# Altium PCB TIE2019_rezolvare.PcbDoc (part 1 of 2)
Units mm, origin at the board's own origin, x right, y up, seen from the top; angles counter-clockwise.
Board outline 267 x 129 mm, 8 copper layers (Signal 1, GND/Signal 2, GND 3, Signal 4, GND, Power/Signal 6, GND 7, Signal 8), stack 1.597 mm thick; 97 components, 82 nets, 657 pads, 352 vias.
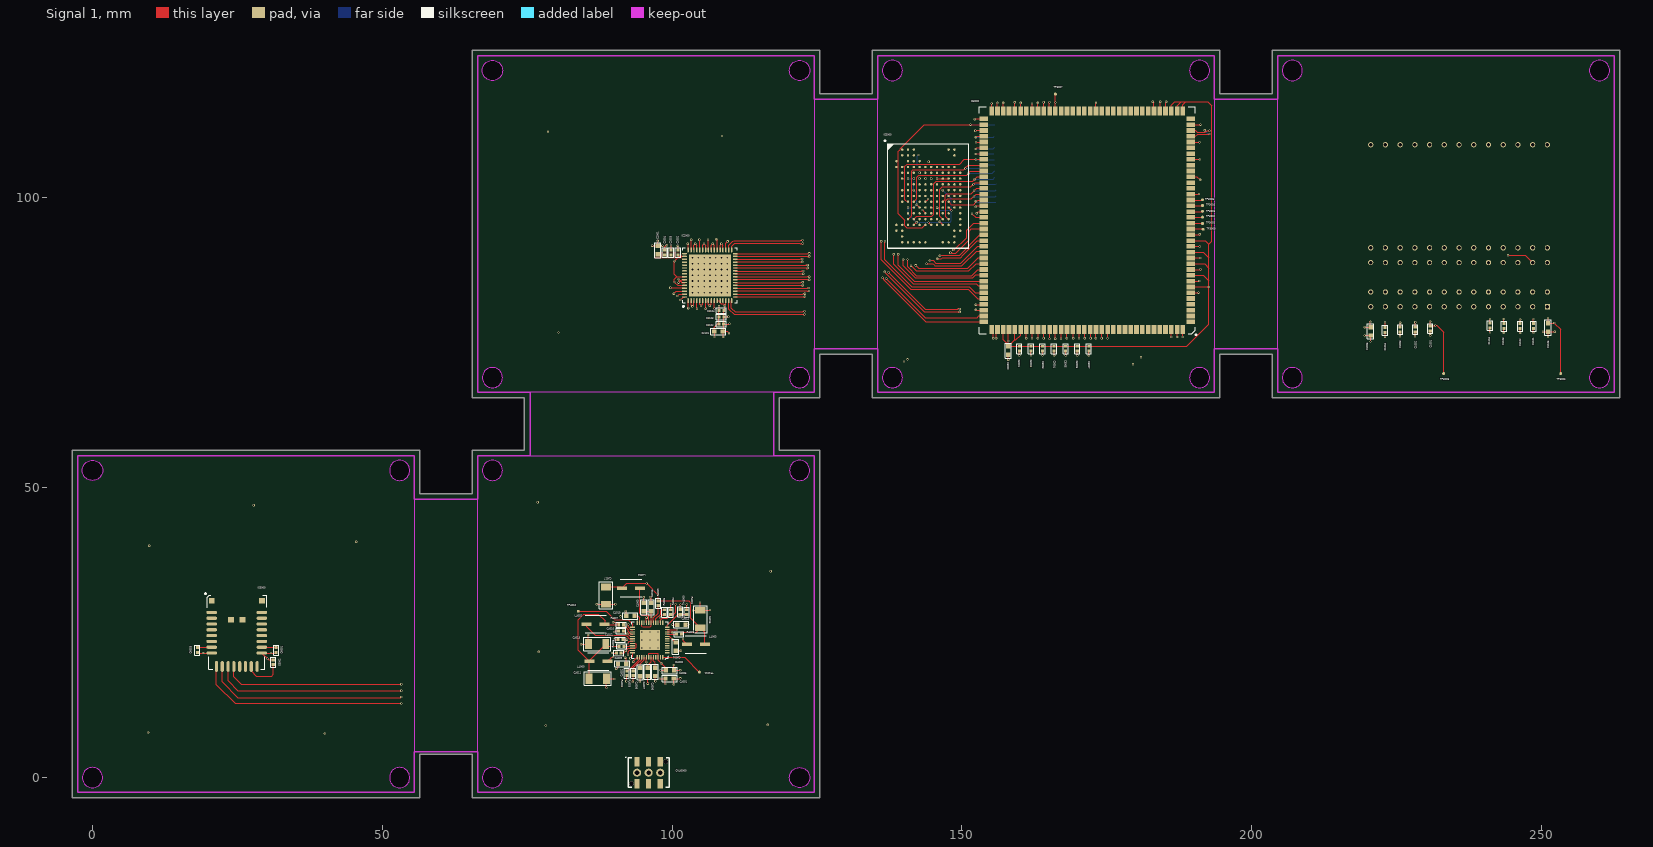
[diagram p0: Signal 1 view]
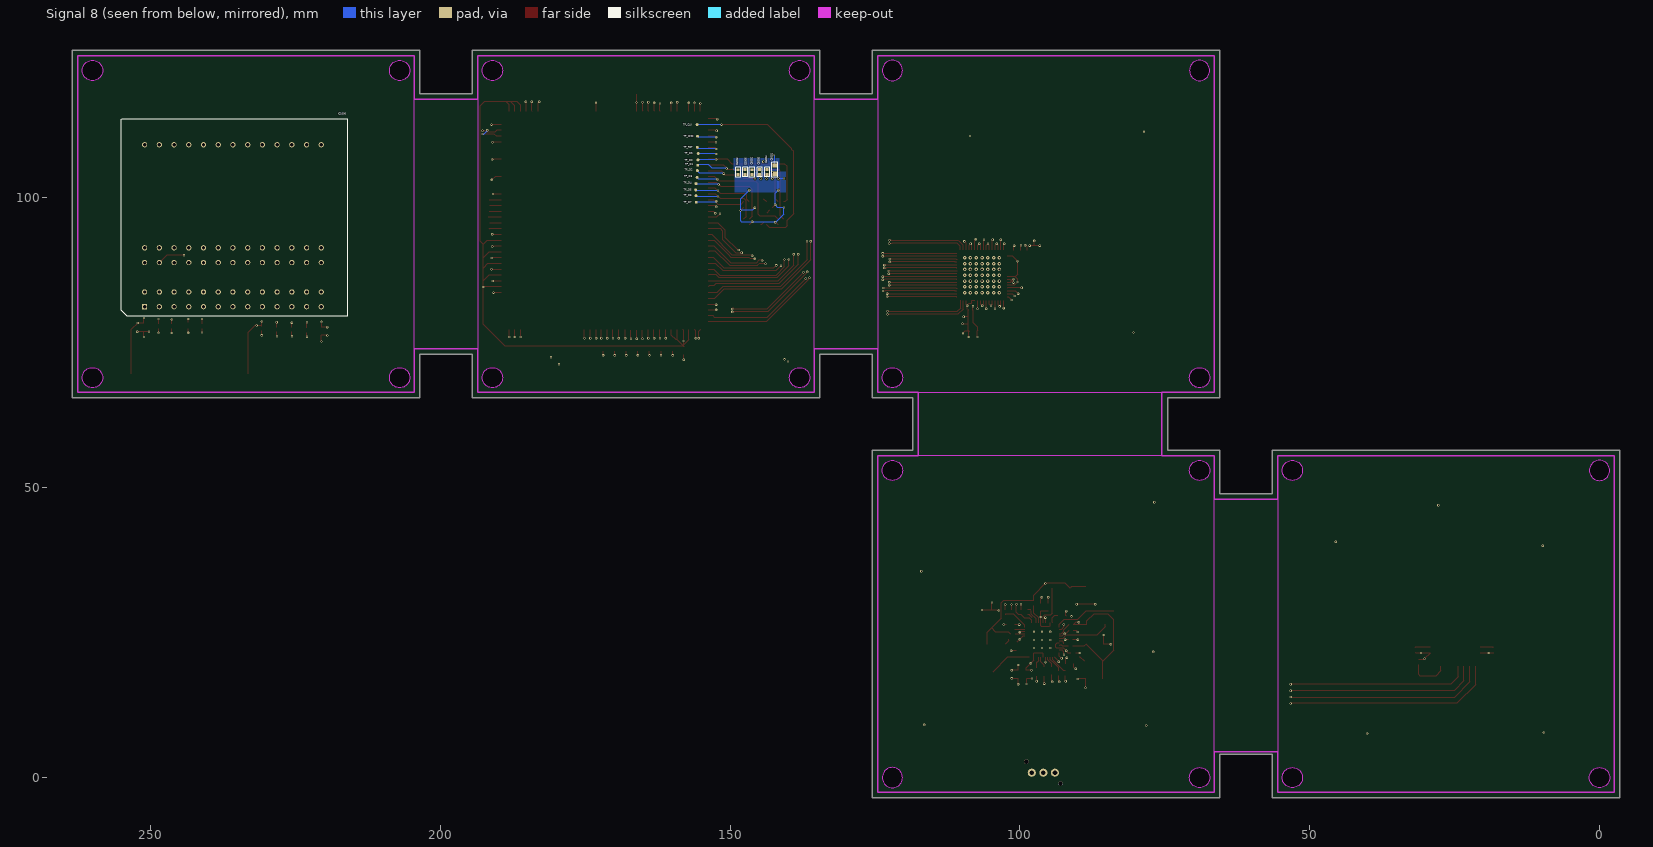
[diagram p1: Signal 8 view, seen from below]
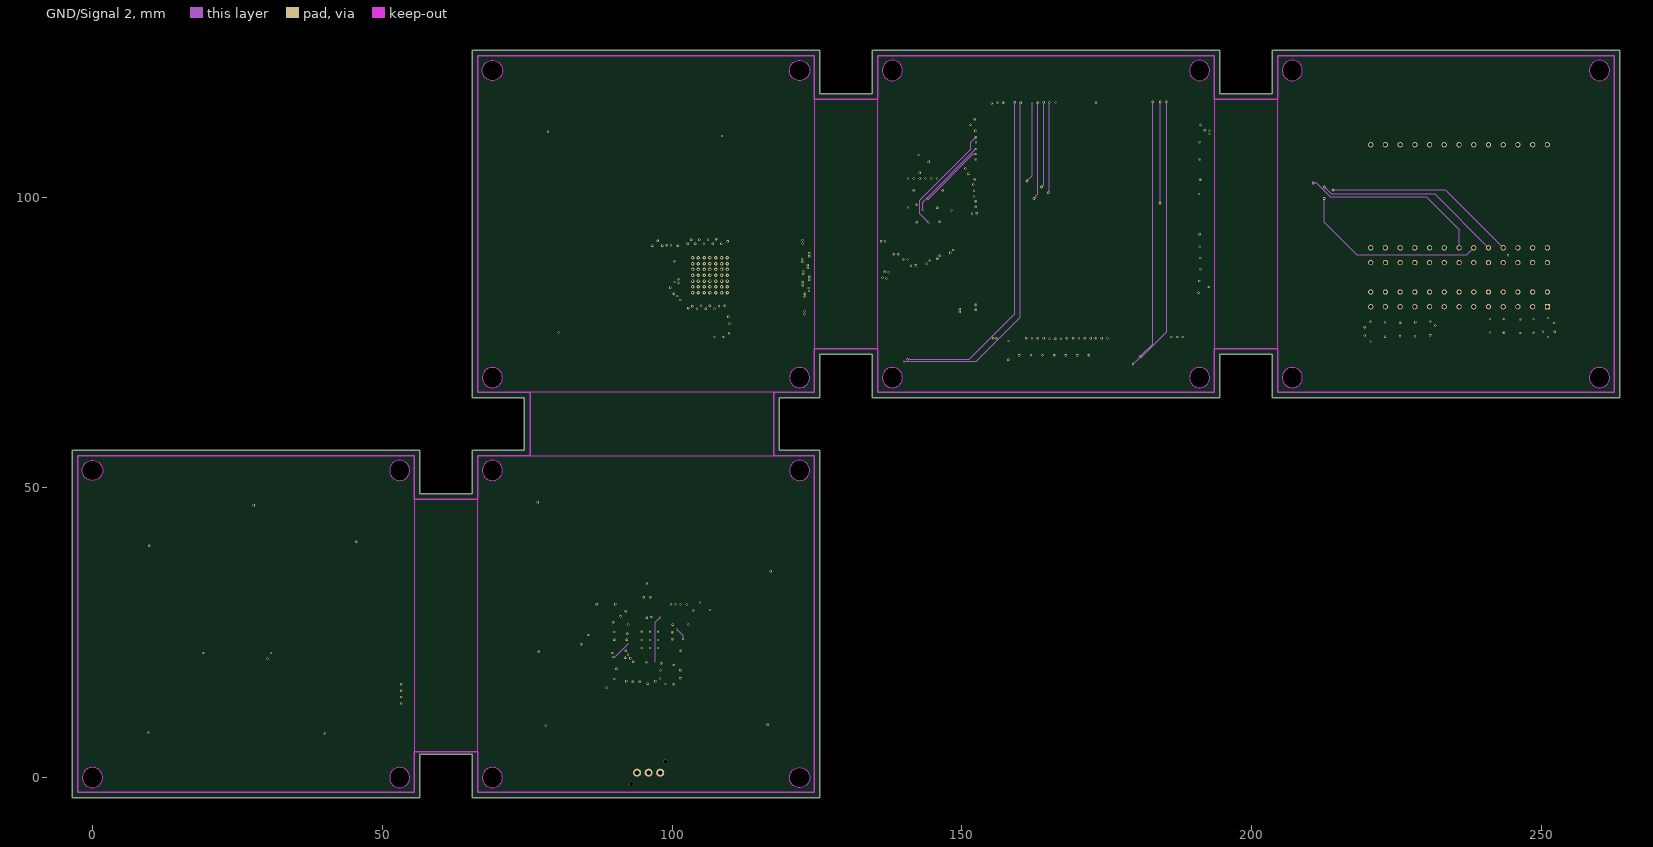
[diagram p2: GND/Signal 2]
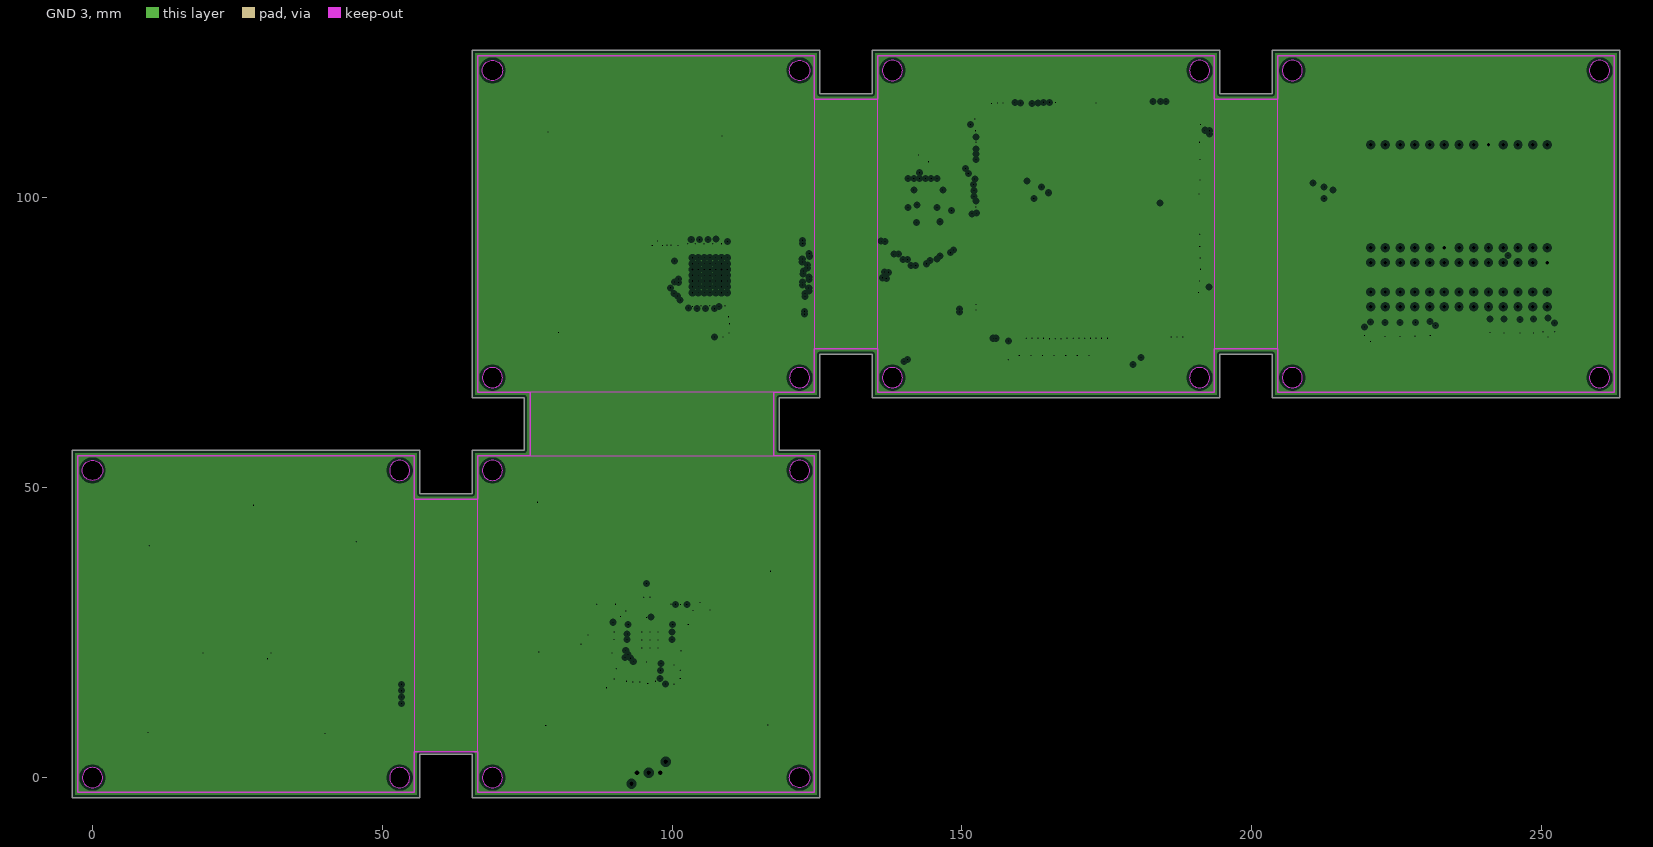
[diagram p3: GND 3, clearances drawn from the general rule]
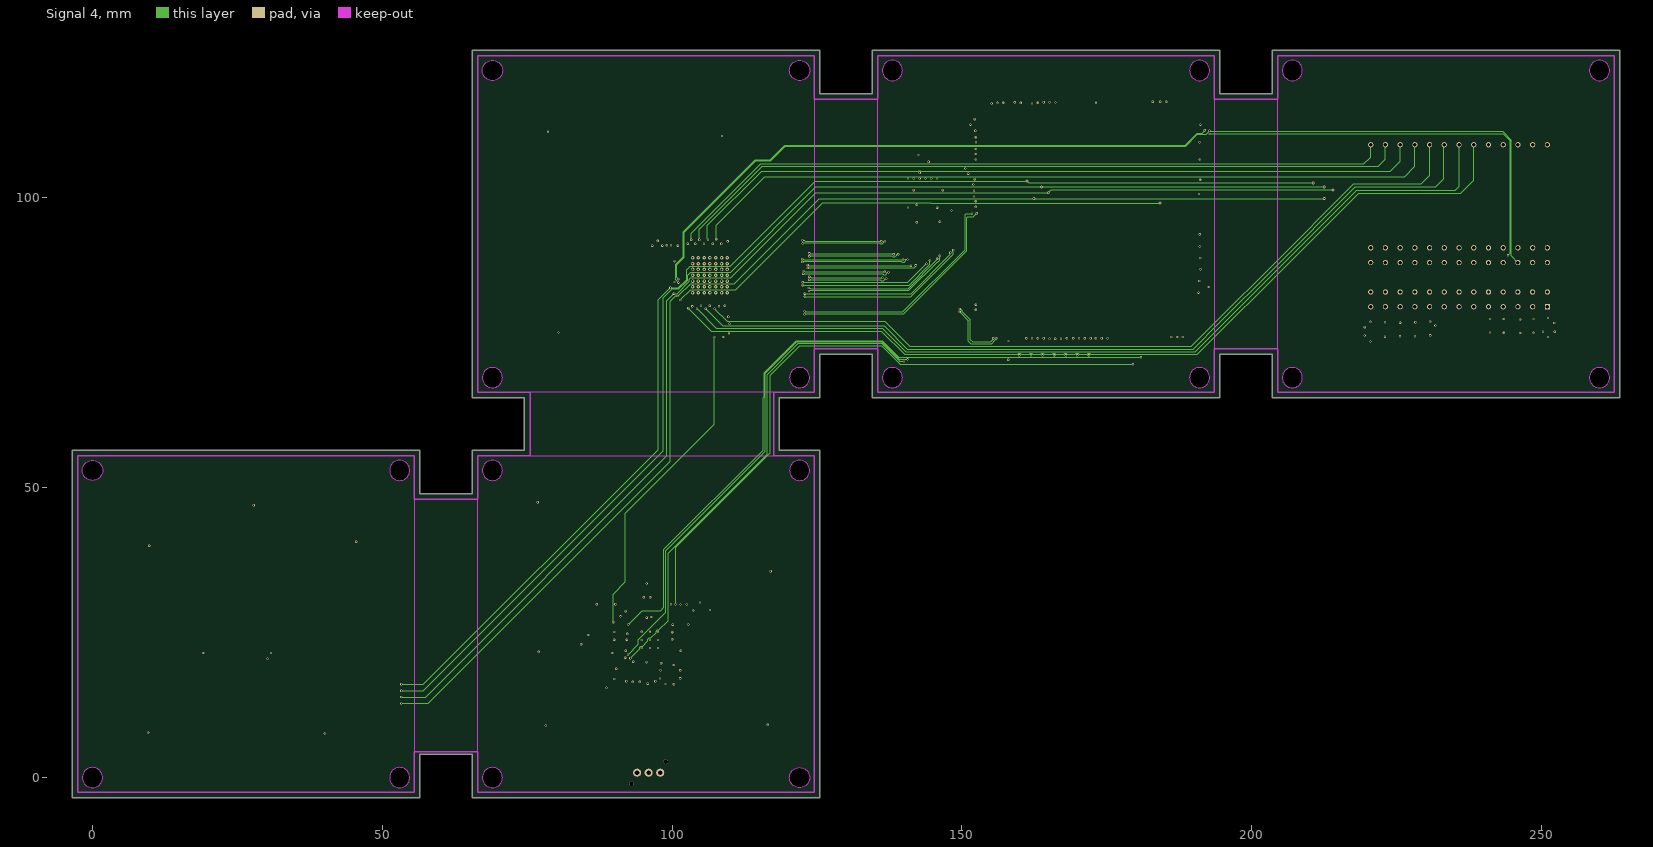
[diagram p4: Signal 4]
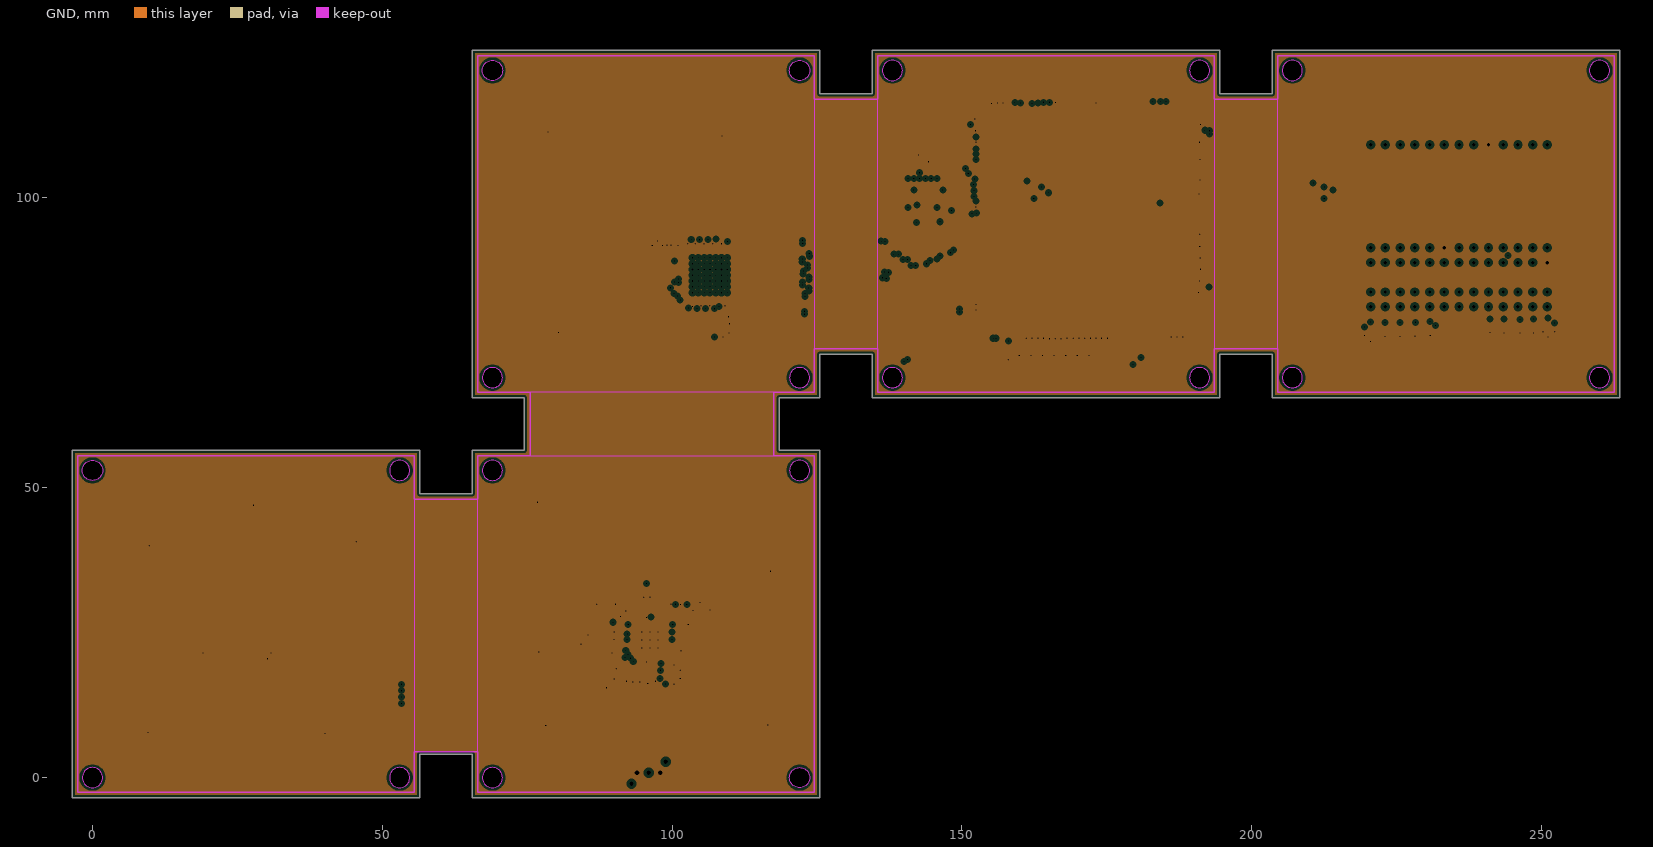
[diagram p5: GND, clearances drawn from the general rule]
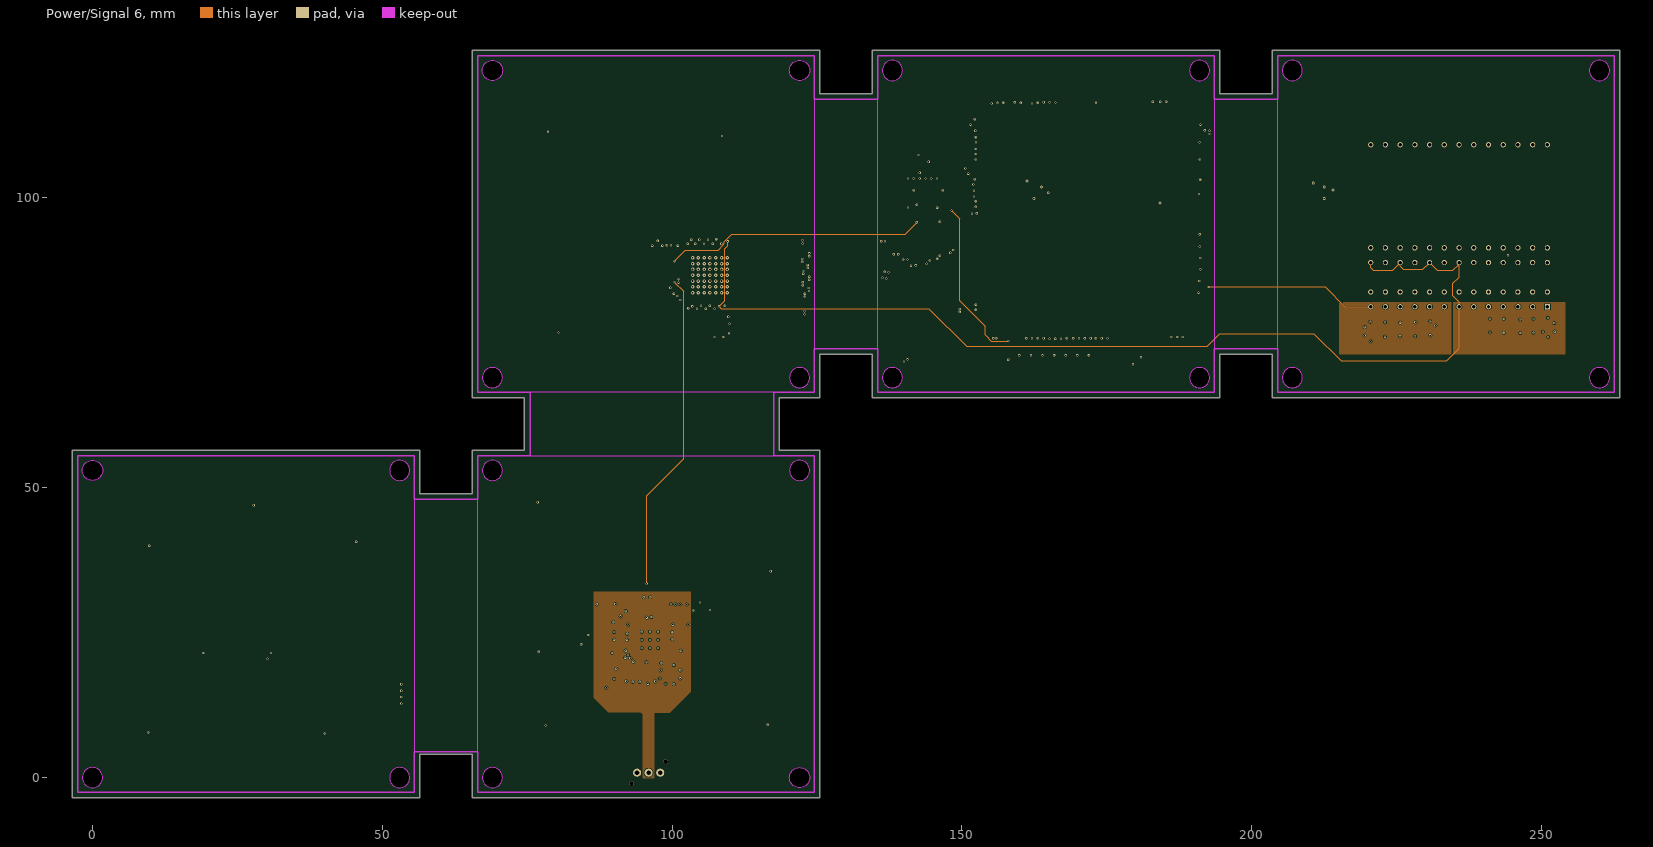
[diagram p6: Power/Signal 6]
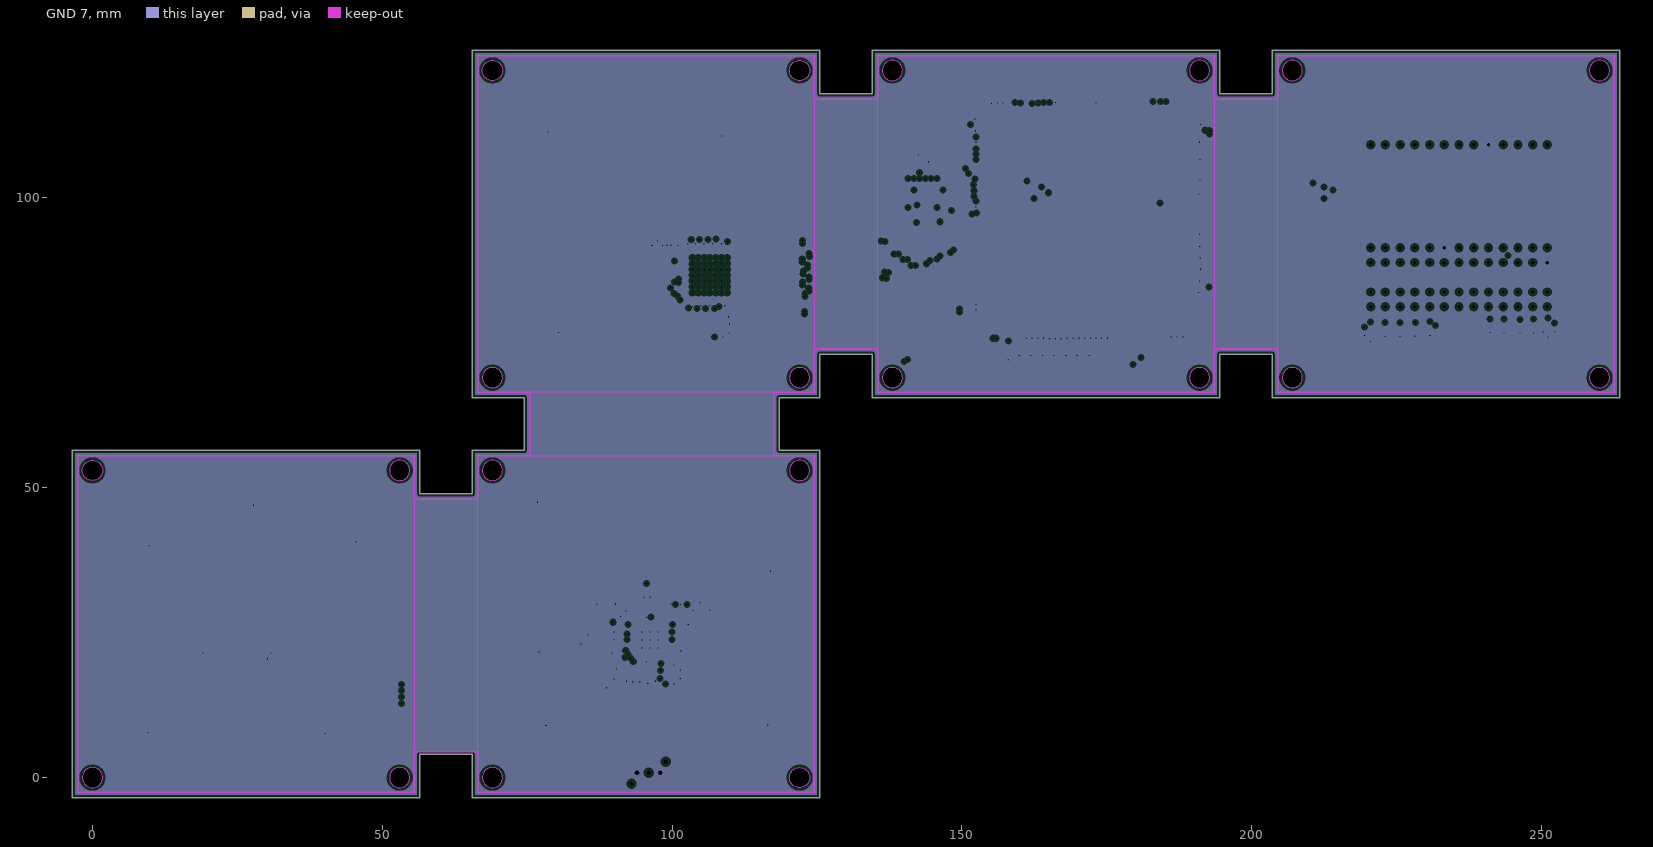
[diagram p7: GND 7, clearances drawn from the general rule]
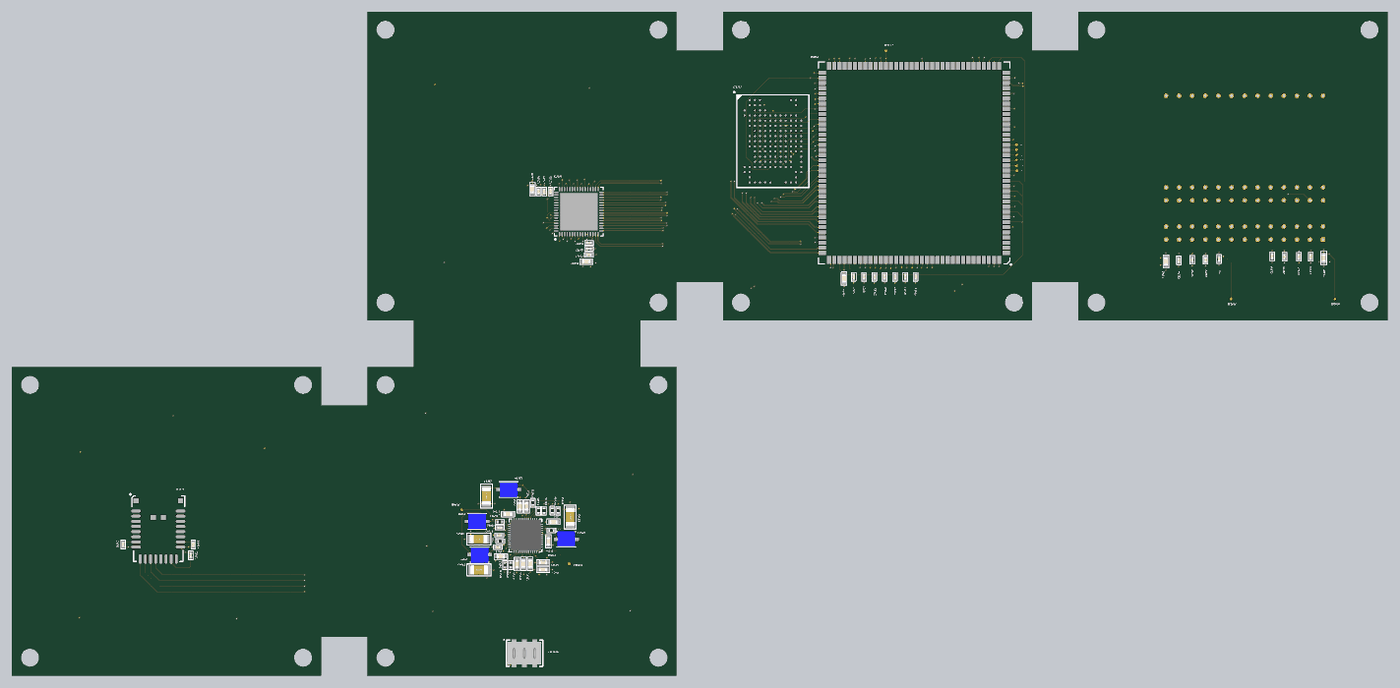
[diagram p9: 3D render of the assembled board from above, using the file's embedded part models]
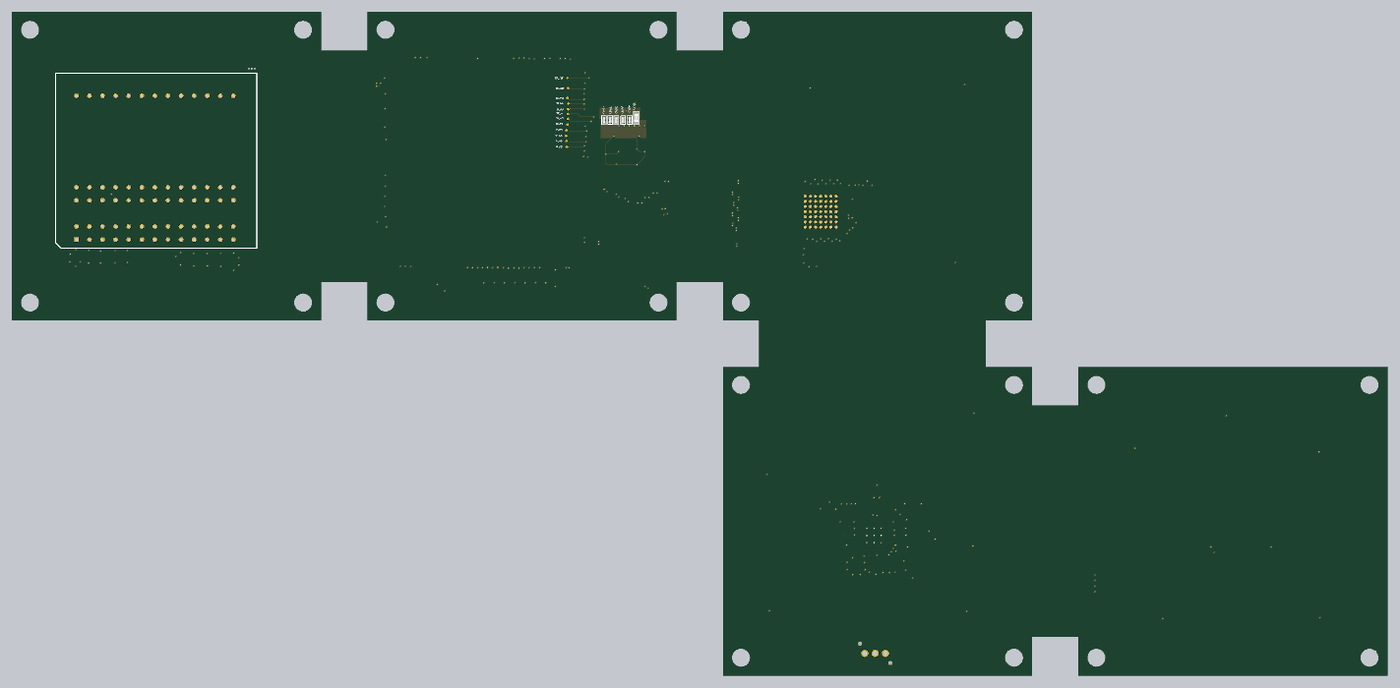
[diagram p10: 3D render of the assembled board from below, using the file's embedded part models]

## Layer stack, top to bottom
Top Solder: solder mask 0.05, FC-001, Dk 4
Top Solder: solder mask 0.02, Solder Resist, Dk 3.5
Signal 1: signal copper 0.43
Dielectric 2: prepreg 0.173, PP-006, Dk 4.1
GND/Signal 2: signal copper 0.043
Dielectric 4: prepreg 0.3, PP-006, Dk 4.1
GND 3: plane copper 0.018, net GND
Dielectric 5: prepreg 0.075, PP-006, Dk 4.1
Signal 4: signal copper 0.018
Dielectric 9: core 0.05, Composite dielectric, Dk 4.8
Dielectric 8: core 0.04, Core-009, Dk 4.5
Dielectric 1: core 0.05, Composite dielectric, Dk 4.8
GND: plane copper 0.018, net GND
Dielectric 6: prepreg 0.075, PP-006, Dk 4.1
Power/Signal 6: signal copper 0.018
Dielectric 7: prepreg 0.03, PP-006, Dk 4.1
GND 7: plane copper 0.043, net GND
Dielectric 3: prepreg 0.173, PP-006, Dk 4.1
Signal 8: signal copper 0.043
Flex Bottom Coverlay: solder mask 0.02, Solder Resist, Dk 3.5
Flex Bottom Coverlay: solder mask 0.05, FC-001, Dk 4

## Board outline
-3.5,-3.5 56.5,-3.5 56.5,4 65.5,4 65.5,-3.5 125.5,-3.5 125.5,56.5 118.5,56.5 118.5,65.5 125.5,65.5 125.5,73 134.5,73 134.5,65.5 194.5,65.5 194.5,73 203.5,73 203.5,65.5 263.5,65.5 263.5,125.5 203.5,125.5 203.5,118 194.5,118 194.5,125.5 134.5,125.5 134.5,118 125.5,118 125.5,125.5 65.5,125.5 65.5,65.5 74.5,65.5 74.5,56.5 65.5,56.5 65.5,49 56.5,49 56.5,56.5 -3.5,56.5
cut-out: 258.25,122 ccw(c260,122) 260,120.25 ccw(c260,122) 261.75,122 ccw(c260,122) 260,123.75 ccw(c260,122)
cut-out: 207,120.25 ccw(c207,122) 208.75,122 ccw(c207,122) 207,123.75 ccw(c207,122) 205.25,122 ccw(c207,122)
cut-out: 191,120.25 ccw(c191,122) 192.75,122 ccw(c191,122) 191,123.75 ccw(c191,122) 189.25,122 ccw(c191,122)
cut-out: 136.25,122 ccw(c138,122) 138,120.25 ccw(c138,122) 139.75,122 ccw(c138,122) 138,123.75 ccw(c138,122)
cut-out: 260,67.25 ccw(c260,69) 261.75,69 ccw(c260,69) 260,70.75 ccw(c260,69) 258.25,69 ccw(c260,69)
cut-out: 191,67.25 ccw(c191,69) 192.75,69 ccw(c191,69) 191,70.75 ccw(c191,69) 189.25,69 ccw(c191,69)
cut-out: 205.25,69 ccw(c207,69) 207,67.25 ccw(c207,69) 208.75,69 ccw(c207,69) 207,70.75 ccw(c207,69)
cut-out: 138,67.25 ccw(c138,69) 139.75,69 ccw(c138,69) 138,70.75 ccw(c138,69) 136.25,69 ccw(c138,69)
cut-out: 120.25,122 cw(c122,122) 122,123.75 cw(c122,122) 123.75,122 cw(c122,122) 122,120.25 cw(c122,122)
cut-out: 120.25,69 ccw(c122,69) 122,67.25 ccw(c122,69) 123.75,69 ccw(c122,69) 122,70.75 ccw(c122,69)
cut-out: 120.25,53 ccw(c122,53) 122,51.25 ccw(c122,53) 123.75,53 ccw(c122,53) 122,54.75 ccw(c122,53)
cut-out: 67.25,122 cw(c69,122) 69,123.75 cw(c69,122) 70.75,122 cw(c69,122) 69,120.25 cw(c69,122)
cut-out: 67.25,69 ccw(c69,69) 69,67.25 ccw(c69,69) 70.75,69 ccw(c69,69) 69,70.75 ccw(c69,69)
cut-out: 67.25,53 ccw(c69,53) 69,51.25 ccw(c69,53) 70.75,53 ccw(c69,53) 69,54.75 ccw(c69,53)
cut-out: 120.25,0 cw(c122,0) 122,1.75 cw(c122,0) 123.75,0 cw(c122,0) 122,-1.75 cw(c122,0)
cut-out: 67.25,0 ccw(c69,0) 69,-1.75 ccw(c69,0) 70.75,0 ccw(c69,0) 69,1.75 ccw(c69,0)
cut-out: 51.25,53 ccw(c53,53) 53,51.25 ccw(c53,53) 54.75,53 ccw(c53,53) 53,54.75 ccw(c53,53)
cut-out: 0,51.25 cw(c0,53) -1.75,53 cw(c0,53) 0,54.75 cw(c0,53) 1.75,53 cw(c0,53)
cut-out: 53,-1.75 ccw(c53,0) 54.75,0 ccw(c53,0) 53,1.75 ccw(c53,0) 51.25,0 ccw(c53,0)
cut-out: -1.75,0 ccw(c0,0) 0,-1.75 ccw(c0,0) 1.75,0 ccw(c0,0) 0,1.75 ccw(c0,0)
board region "RIGID A": 56.5,-3.5 -3.5,-3.5 -3.5,56.5 56.5,56.5
board region "Layer Stack Region 1": 65.5,4 56.5,4 56.5,49 65.5,49
board region "RIGID B": 125.5,56.5 125.5,-3.5 65.5,-3.5 65.5,49 65.5,56.5
board region "RIGID C": 125.5,73 125.5,65.5 118.5,65.5 65.5,65.5 65.5,125.5 125.5,125.5
board region "Layer Stack Region 2": 118.5,65.5 118.5,56.5 74.5,56.5 74.5,65.5
board region "Layer Stack Region 3": 134.5,73 125.5,73 125.5,118 134.5,118
board region "RIGID D": 194.5,73 194.5,65.5 134.5,65.5 134.5,118 134.5,125.5 194.5,125.5
board region "Layer Stack Region 4": 203.5,73 194.5,73 194.5,118 203.5,118
board region "RIGID E": 203.5,118 203.5,125.5 263.5,125.5 263.5,65.5 203.5,65.5

## Design rules (kind name [scope] priority, off if disabled: settings)
Clearance Clearance_1 [All] p1: gap=0.1 ignorepadtopadclearanceinfootprint=FALSE
Clearance [InNetClass('eMMC_Bus')] p2: gap=0.21 ignorepadtopadclearanceinfootprint=FALSE
DiffPairsRouting DiffPairsRouting_LVDS_DIFF [InDifferentialPairClass('LVDS_DIFF')] p1: maxlimit=0.23 minlimit=0.23 mostfreqgap=0.23 toplayer_minwidth=0.2 toplayer_maxwidth=0.2 toplayer_prefwidth=0.2 midlayer1_minwidth=0.09 midlayer1_maxwidth=0.09 midlayer1_prefwidth=0.09 midlayer2_minwidth=0.09 midlayer2_maxwidth=0.09 midlayer2_prefwidth=0.09 midlayer3_minwidth=0.09 midlayer3_maxwidth=0.09 midlayer3_prefwidth=0.09 bottomlayer_minwidth=0.2 bottomlayer_maxwidth=0.2 bottomlayer_prefwidth=0.2 substack1={2D9F6985-649F-40C4-A361-7E10F32C00A7} toplayer_{2d9f6985-649f-40c4-a361-7e10f32c00a7}_mingap=0.2 toplayer_{2d9f6985-649f-40c4-a361-7e10f32c00a7}_maxgap=0.2 toplayer_{2d9f6985-649f-40c4-a361-7e10f32c00a7}_prefgap=0.2 toplayer_{2d9f6985-649f-40c4-a361-7e10f32c00a7}_minwidth=0.09 toplayer_{2d9f6985-649f-40c4-a361-7e10f32c00a7}_maxwidth=0.09 toplayer_{2d9f6985-649f-40c4-a361-7e10f32c00a7}_prefwidth=0.09 midlayer1_{2d9f6985-649f-40c4-a361-7e10f32c00a7}_mingap=0.2 midlayer1_{2d9f6985-649f-40c4-a361-7e10f32c00a7}_maxgap=0.2 midlayer1_{2d9f6985-649f-40c4-a361-7e10f32c00a7}_prefgap=0.2 midlayer1_{2d9f6985-649f-40c4-a361-7e10f32c00a7}_minwidth=0.09 midlayer1_{2d9f6985-649f-40c4-a361-7e10f32c00a7}_maxwidth=0.09 midlayer1_{2d9f6985-649f-40c4-a361-7e10f32c00a7}_prefwidth=0.09 midlayer2_{2d9f6985-649f-40c4-a361-7e10f32c00a7}_minwidth=0.09 midlayer2_{2d9f6985-649f-40c4-a361-7e10f32c00a7}_maxwidth=0.09 midlayer2_{2d9f6985-649f-40c4-a361-7e10f32c00a7}_prefwidth=0.09 midlayer3_{2d9f6985-649f-40c4-a361-7e10f32c00a7}_minwidth=0.09 midlayer3_{2d9f6985-649f-40c4-a361-7e10f32c00a7}_maxwidth=0.09 midlayer3_{2d9f6985-649f-40c4-a361-7e10f32c00a7}_prefwidth=0.09 bottomlayer_{2d9f6985-649f-40c4-a361-7e10f32c00a7}_mingap=0.2 bottomlayer_{2d9f6985-649f-40c4-a361-7e10f32c00a7}_maxgap=0.2 bottomlayer_{2d9f6985-649f-40c4-a361-7e10f32c00a7}_prefgap=0.2 bottomlayer_{2d9f6985-649f-40c4-a361-7e10f32c00a7}_minwidth=0.09 bottomlayer_{2d9f6985-649f-40c4-a361-7e10f32c00a7}_maxwidth=0.09 bottomlayer_{2d9f6985-649f-40c4-a361-7e10f32c00a7}_prefwidth=0.09 filterlayerstackid={3405C773-BCB3-445C-810F-5A09EFCF737A} maxuncoupledlength=3
DiffPairsRouting DiffPairsRouting_DIFF_PAIRS [InDifferentialPairClass('DIFF_PAIRS')] p2: maxlimit=0.23 minlimit=0.23 mostfreqgap=0.23 toplayer_minwidth=0.2 toplayer_maxwidth=0.2 toplayer_prefwidth=0.2 midlayer1_minwidth=0.09 midlayer1_maxwidth=0.09 midlayer1_prefwidth=0.09 midlayer2_minwidth=0.09 midlayer2_maxwidth=0.09 midlayer2_prefwidth=0.09 midlayer3_minwidth=0.09 midlayer3_maxwidth=0.09 midlayer3_prefwidth=0.09 bottomlayer_minwidth=0.2 bottomlayer_maxwidth=0.2 bottomlayer_prefwidth=0.2 substack1={2D9F6985-649F-40C4-A361-7E10F32C00A7} toplayer_{2d9f6985-649f-40c4-a361-7e10f32c00a7}_mingap=0.2 toplayer_{2d9f6985-649f-40c4-a361-7e10f32c00a7}_maxgap=0.2 toplayer_{2d9f6985-649f-40c4-a361-7e10f32c00a7}_prefgap=0.2 toplayer_{2d9f6985-649f-40c4-a361-7e10f32c00a7}_minwidth=0.09 toplayer_{2d9f6985-649f-40c4-a361-7e10f32c00a7}_maxwidth=0.09 toplayer_{2d9f6985-649f-40c4-a361-7e10f32c00a7}_prefwidth=0.09 midlayer1_{2d9f6985-649f-40c4-a361-7e10f32c00a7}_mingap=0.2 midlayer1_{2d9f6985-649f-40c4-a361-7e10f32c00a7}_maxgap=0.2 midlayer1_{2d9f6985-649f-40c4-a361-7e10f32c00a7}_prefgap=0.2 midlayer1_{2d9f6985-649f-40c4-a361-7e10f32c00a7}_minwidth=0.09 midlayer1_{2d9f6985-649f-40c4-a361-7e10f32c00a7}_maxwidth=0.09 midlayer1_{2d9f6985-649f-40c4-a361-7e10f32c00a7}_prefwidth=0.09 midlayer2_{2d9f6985-649f-40c4-a361-7e10f32c00a7}_minwidth=0.09 midlayer2_{2d9f6985-649f-40c4-a361-7e10f32c00a7}_maxwidth=0.09 midlayer2_{2d9f6985-649f-40c4-a361-7e10f32c00a7}_prefwidth=0.09 midlayer3_{2d9f6985-649f-40c4-a361-7e10f32c00a7}_minwidth=0.09 midlayer3_{2d9f6985-649f-40c4-a361-7e10f32c00a7}_maxwidth=0.09 midlayer3_{2d9f6985-649f-40c4-a361-7e10f32c00a7}_prefwidth=0.09 bottomlayer_{2d9f6985-649f-40c4-a361-7e10f32c00a7}_mingap=0.2 bottomlayer_{2d9f6985-649f-40c4-a361-7e10f32c00a7}_maxgap=0.2 bottomlayer_{2d9f6985-649f-40c4-a361-7e10f32c00a7}_prefgap=0.2 bottomlayer_{2d9f6985-649f-40c4-a361-7e10f32c00a7}_minwidth=0.09 bottomlayer_{2d9f6985-649f-40c4-a361-7e10f32c00a7}_maxwidth=0.09 bottomlayer_{2d9f6985-649f-40c4-a361-7e10f32c00a7}_prefwidth=0.09 filterlayerstackid={3405C773-BCB3-445C-810F-5A09EFCF737A} maxuncoupledlength=3
Height [All] p1: minheight=0 maxheight=30 prefheight=12.7
HoleToHoleClearance [All] p1: gap=0.1 allowstackedmicrovias=TRUE
MinimumSolderMaskSliver [All] p1: minsoldermaskwidth=0.1
PlaneClearance [All] p1: clearance=0.508
PlaneConnect [All] p1: planeconnectstyle=Relief reliefexpansion=0.2 reliefentries=2 reliefconductorwidth=0.1 reliefairgap=0.1
PolygonConnect [All] p1: connectstyle=Relief reliefconductorwidth=0.1 reliefentries=2 polygonreliefangle="90 Angle" airgapwidth=0.1
RoutingVias RoutingVias_Buried [IsVia AND (StartLayer = 'GND/Signal 2') AND (StopLayer = 'GND 7')] p1: holewidth=0.2 width=0.5 viastyle="Through Hole" minholewidth=0.2 minwidth=0.5 maxholewidth=0.2 maxwidth=0.5
RoutingVias RoutingVias_BLIND7_8 [IsVia AND (StartLayer = 'GND 7') AND (StopLayer = 'Signal 8')] p2: holewidth=0.125 width=0.325 viastyle="Through Hole" minholewidth=0.125 minwidth=0.325 maxholewidth=0.125 maxwidth=0.325
RoutingVias RoutingVias_BLIND1_2 [IsVia AND (StartLayer = 'Signal 1') AND (StopLayer = 'GND/Signal 2')] p3: holewidth=0.125 width=0.325 viastyle="Through Hole" minholewidth=0.125 minwidth=0.325 maxholewidth=0.125 maxwidth=0.325
RoutingVias [All] p4: holewidth=0.2 width=0.4 viastyle="Through Hole" minholewidth=0.2 minwidth=0.4 maxholewidth=0.2 maxwidth=0.4
SilkToSilkClearance [All] p1: silktosilkclearance=0.1
SilkToSolderMaskClearance [IsPad] p1: minsilkscreentomaskgap=0.1 clearancetoexposedcopper=TRUE
SolderMaskExpansion [All] p1: expansion=0.102 istentingtop=FALSE
SupplyNets "Schematic Supply Nets_6" [InNet('+V_LDO_RF_3V3')] p1: voltage=0.000
SupplyNets "Schematic Supply Nets_5" [InNet('GND')] p2: voltage=0.000
SupplyNets "Schematic Supply Nets_3" [InNet('+V_SMPS_1V8')] p3: voltage=0.000
SupplyNets "Schematic Supply Nets_2" [InNet('+V_IN')] p4: voltage=0.000
SupplyNets "Schematic Supply Nets_1" [InNet('+V_SMPS_3V3')] p5: voltage=0.000
Width [All] p1: maxlimit=0.1 minlimit=0.07 preferedwidth=0.07 substack1={2D9F6985-649F-40C4-A361-7E10F32C00A7}
22 further rules are at their usual default settings.

## Classes and differential pairs
component class TIE_2019_rezolvare_page_2: C1001 C1002 C1003 C1004 C1005 C1101 C1102 C1103 C1104 C1105 C2001 C2002 C2003 C2004 C2101 C2102 C2103 C2104 C3000 C3001 C3002 C3003 C3004 C3005 C3006 C3007 C5001 C5002 C5003 C5004 C5005 C5006 C6001 C6002 C6003 IC1000 IC2000 IC3000 IC5000 IC6000 TP3000 TP3001 TP3002 TP3003 TP3004 TP3005 TP3006 TP3007 TP3008 TP_CLK TP_CMD TP_D0 TP_D1 TP_D2 TP_D3 TP_D4 TP_D5 TP_D6 TP_D7 TP_DS TP_RST
component class TIE_2019_rezolvare_page_1: C4001 C4002 C4003 C4004 C4005 C4006 C4007 C4008 C4009 C4010 C4011 C4012 C4013 C4014 C4015 C4016 C4017 C4019 CN40000 IC4000 L4000 L4002 L4003 L4004 R4001 R4002 R4003 R4004 R4005 R4006 R4007 R4008 R4009 TH4000 TP4010 TP4011
differential pair LVDS_D7: +LVDS_D7_P -LVDS_D7_N
differential pair LVDS_D6: +LVDS_D6_P -LVDS_D6_N
differential pair LVDS_D5: +LVDS_D5_P -LVDS_D5_N
differential pair LVDS_D4: +LVDS_D4_P -LVDS_D4_N
differential pair LVDS_D3: +LVDS_D3_P -LVDS_D3_N
differential pair LVDS_D2: +LVDS_D2_P -LVDS_D2_N
differential pair LVDS_D1: +LVDS_D1_P -LVDS_D1_N
differential pair LVDS_D0: +LVDS_D0_P -LVDS_D0_N
differential pair FRAME_CLK: +FRAME_CLK_P -FRAME_CLK_N
differential pair BIT_CLK: +BIT_CLK_P -BIT_CLK_N
differential pair ADC_CLK: +ADC_CLK_P -ADC_CLK_N

## Components (designator, comment, footprint, x,y, rotation, side; value= is the part's Value field where it differs from the comment)
C1001 "100nF" CAP0402 230.8,77.48 r90 top
C1002 "100nF" CAP0402 228.2,77.3 r90 top
C1003 "100nF" CAP0402 225.6,77.3 r90 top
C1004 "100nF" CAP0402 223,77.2 r90 top
C1005 "10uF" CAP0603 220.5,77 r90 top
C1101 "100nF" CAP0402 248.6,77.9 r90 top
C1102 "100nF" CAP0402 246.3,77.9 r90 top
C1103 "100nF" CAP0402 243.5,77.9 r90 top
C1104 "100nF" CAP0402 241.1,78 r90 top
C1105 "10uF" CAP0603 251.118,77.655 r90 top
C2001 "10uF" CAP0603 97.525,91.02 r270 top
C2002 "100nF" CAP0402 101.025,90.585 r270 top
C2003 "100nF" CAP0402 99.825,90.585 r270 top
C2004 "100nF" CAP0402 98.725,90.585 r270 top
C2101 "10uF" CAP0603 108,76.975 r180 top
C2102 "100nF" CAP0402 108.481,78.257 r180 top
C2103 "100nF" CAP0402 108.5,79.475 r180 top
C2104 "100nF" CAP0402 108.5,80.6 r180 top
C3000 "10uF" CAP0603 158,73.68 r270 top
C3001 "100nF" CAP0402 159.9,74 r270 top
C3002 "100nF" CAP0402 161.9,74 r270 top
C3003 "10nF" CAP0402 163.9,74 r270 top
C3004 "100nF" CAP0402 165.9,74 r270 top
C3005 "100nF" CAP0402 167.9,74 r270 top
C3006 "100nF" CAP0402 169.9,74 r270 top
C3007 "100nF" CAP0402 171.9,74 r270 top
C4001 "10uF" CAP0603 99.58,17.1 r180 top
C4002 "10uF" CAP0603 91.395,19.65 r0 top
C4003 "2.2uF" CAP0603 95.1,29.4 r270 top
C4004 "2.2uF" CAP0603 100.6,22.6 r270 top
C4005 "2.2uF" CAP0603 99.6,18.5 r0 top
C4006 "2.2uF" CAP0603 97.075,18.25 r90 top
C4007 "2.2uF" CAP0603 95.775,18.25 r90 top
C4008 "2.2uF" CAP0603 94.5,18.2 r90 top
C4009 "100nF" CAP0402 90.8,21.5 r0 top
C4010 "4.7uF" CAP0402 91.18,25.3 r180 top
C4011 "47uF" CAP1206 87.175,17.05 r180 top
C4012 "4.7uF" CAP0402 91.08,23.8 r180 top
C4013 "47uF" CAP1206 87.075,23.05 r0 top
C4014 "4.7uF" CAP0603 101.6,26.4 r0 top
C4015 "47uF" CAP1206 104.875,27.35 r270 top
C4016 "4.7uF" CAP0603 96.4,29.4 r90 top
C4017 "47uF" CAP1206 88.6,31.4 r90 top
C4019 "2.2uF" CAP0603 92.78,27.9 r0 top
C5001 "10uF" CAP0603 142.3,104.87 r90 bottom
C5002 "100nF" CAP0402 146.2,104.45 r90 bottom
C5003 "100nF" CAP0402 148.6,104.45 r90 bottom
C5004 "100nF" CAP0402 143.6,104.47 r270 bottom
C5005 "100nF" CAP0402 144.9,104.47 r270 bottom
C5006 "100nF" CAP0402 147.4,104.47 r270 bottom
C6001 "100nF" CAP0402 31.7,22 r90 top
C6002 "100nF" CAP0402 31.2,19.9 r270 top
C6003 "100nF" CAP0402 18.1,22 r90 top
CN40000 "Connector 1x3" CONN1X03 95.95,0.85 r0 top
IC1000 "PGA65" PGAx13 251,81.24 r180 bottom
IC2000 "ADC219" QFN64 106.524,86.665 r90 top
IC3000 "IMX6-CPU" IMX6-SoM 171.625,96.15 r90 top
IC4000 "PMIC219" 48-QFN 96.175,23.75 r180 top
IC5000 "eMMC219" BGA100 144.2,100.35 r0 top
IC6000 "TRX219" A1101R09C00GM 24.9,25 r0 top
L4000 "1uH/4.2A" L_1212AB 87.275,20.05 r180 top
L4002 "1uH/4.2A" L_1212AB 86.8,26.5 r0 top
L4003 "1uH/4.2A" L_1212AB 104.1,23 r0 top
L4004 "1uH/4.2A" L_1212AB 92.9,32.7 r180 top
R4001 "4.7k" RES0402 102.525,28.55 r90 top
R4002 "0R" RES0402 92.2,17.99 r90 top
R4003 "0R" RES0402 93.3,18 r90 top
R4004 "49.9R" RES0402 99.775,28.55 r270 top
R4005 "10k" RES0402 98.675,28.55 r270 top
R4006 "0R" RES0402 91.285,22.65 r180 top
R4007 "0R" RES0402 91.205,26.385 r180 top
R4008 "0R" RES0402 101.195,24.75 r0 top
R4009 "0R" RES0402 97.6,30.1 r90 top
TH4000 "10K" RES0402 101.4,28.59 r270 top
TP3000 "TestPoint" TestPoint_2019 191.6,94.6 r90 top
TP3001 "TestPoint" TestPoint_2019 191.5,95.6 r90 top
TP3002 "TestPoint" TestPoint_2019 191.5,96.7 r90 top
TP3003 "TestPoint" TestPoint_2019 191.5,97.7 r90 top
TP3004 "TestPoint" TestPoint_2019 191.5,98.7 r180 top
TP3005 "TestPoint" TestPoint_2019 191.5,99.7 r90 top
TP3006 "TestPoint" TestPoint_2019 253.3,69.7 r90 top
TP3007 "TestPoint" TestPoint_2019 166.127,117.927 r90 top
TP3008 "TestPoint" TestPoint_2019 233.1,69.7 r90 top
TP4010 "TestPoint" TestPoint_2019 83.8,28.7 r270 top
TP4011 "TestPoint" TestPoint_2019 104.7,18.2 r270 top
TP_CLK "TestPoint" TestPoint_2019 155.677,112.649 r180 bottom
TP_CMD "TestPoint" TestPoint_2019 155.6,110.642 r180 bottom
TP_D0 "TestPoint" TestPoint_2019 155.55,106.578 r180 bottom
TP_D1 "TestPoint" TestPoint_2019 155.575,105.639 r180 bottom
TP_D2 "TestPoint" TestPoint_2019 155.626,104.724 r180 bottom
TP_D3 "TestPoint" TestPoint_2019 155.677,103.556 r180 bottom
TP_D4 "TestPoint" TestPoint_2019 155.88,102.489 r180 bottom
TP_D5 "TestPoint" TestPoint_2019 155.931,101.397 r180 bottom
TP_D6 "TestPoint" TestPoint_2019 155.88,100.406 r180 bottom
TP_D7 "TestPoint" TestPoint_2019 155.829,99.263 r180 bottom
TP_DS "TestPoint" TestPoint_2019 155.499,107.671 r180 bottom
TP_RST "TestPoint" TestPoint_2019 155.651,108.737 r180 bottom

## Footprints (in the part's own frame and the unit in brackets; to place one, negate y for a bottom-side part, rotate by r counter-clockwise, add the part's x,y. Pads: shape width x height; smd on the part's side, far side on the other; paste and mask are expansions set on the pad)
48-QFN [mm] "6x6mm QFN Package"
  rect 0.8x0.2 smd mask+0.05: 1(-3,2.2) 2(-3,1.8) 3(-3,1.4) 4(-3,1) 5(-3,0.6) 6(-3,0.2) 7(-3,-0.2) 8(-3,-0.6) 9(-3,-1) 10(-3,-1.4) 11(-3,-1.8) 12(-3,-2.2) 25(3,-2.2) 26(3,-1.8) 27(3,-1.4) 28(3,-1) 29(3,-0.6) 30(3,-0.2) 31(3,0.2) 32(3,0.6) 33(3,1) 34(3,1.4) 35(3,1.8) 36(3,2.2)
  rect 0.2x0.8 smd mask+0.05: 13(-2.2,-3) 14(-1.8,-3) 15(-1.4,-3) 16(-1,-3) 17(-0.6,-3) 18(-0.2,-3) 19(0.2,-3) 20(0.6,-3) 21(1,-3) 22(1.4,-3) 23(1.8,-3) 24(2.2,-3) 37(2.2,3) 38(1.8,3) 39(1.4,3) 40(1,3) 41(0.6,3) 42(0.2,3) 43(-0.2,3) 44(-0.6,3) 45(-1,3) 46(-1.4,3) 47(-1.8,3) 48(-2.2,3)
  rect 3.4x3.4 smd paste-10 mask+0.05: 49(0,0)
  silkscreen extent -3.26,-3.18 3.18,3.29, body extent -3.05,-3.05 3.05,3.05, height 0.9
A1101R09C00GM [mm] "Sub-GHz Modules 900MHz Radio Only Connector"
  oval 1.85x0.55 smd: 1(-4.325,3.5) 2(-4.325,2.5) 3(-4.325,1.5) 4(-4.325,0.5) 5(-4.325,-0.5) 6(-4.325,-1.5) 7(-4.325,-2.5) 8(-4.325,-3.5) 17(4.325,-3.5) 18(4.325,-2.5) 19(4.325,-1.5) 20(4.325,-0.5) 21(4.325,0.5) 22(4.325,1.5) 23(4.325,2.5) 24(4.325,3.5)
  oval 0.55x1.85 smd: 9(-3.5,-5.825) 10(-2.5,-5.825) 11(-1.5,-5.825) 12(-0.5,-5.825) 13(0.5,-5.825) 14(1.5,-5.825) 15(2.5,-5.825) 16(3.5,-5.825)
  rect 1x1 smd: MP1(-4.325,5.5) MP2(4.325,5.5) MP3(-1,2.25) MP4(1,2.25)
  silkscreen extent -5.53,-6.3 5.13,6.86, body extent -4.6,-6.1 4.6,6.1, height 2.1
BGA100 [mm] "BGA, 100-Leads, Body 14.00x18.00mmx1.40mm, Pitch 1.00mm"
  round 0.41 smd: A1(-4.5,8) A2(-3.5,8) A3(-2.5,8) A9(3.5,8) A10(4.5,8) B1(-4.5,7) B2(-3.5,7) B3(-2.5,7) B10(4.5,7) C0(-5.5,6) C2(-3.5,6) C3(-2.5,6) C4(-1.5,6) D0(-5.5,5) D1(-4.5,5) D2(-3.5,5) D3(-2.5,5) D4(-1.5,5) D5(-0.5,5) D6(0.5,5) D7(1.5,5) D8(2.5,5) D9(3.5,5) D10(4.5,5) E1(-4.5,4) E2(-3.5,4) E3(-2.5,4) E4(-1.5,4) E5(-0.5,4) E6(0.5,4) E7(1.5,4) E8(2.5,4) E9(3.5,4) E10(4.5,4) E11(5.5,4) F1(-4.5,3) F2(-3.5,3) F3(-2.5,3) F4(-1.5,3) F5(-0.5,3) F6(0.5,3) F7(1.5,3) F8(2.5,3) F9(3.5,3) F10(4.5,3) F11(5.5,3) G2(-3.5,2) G3(-2.5,2) G4(-1.5,2) G5(-0.5,2) G6(0.5,2) G7(1.5,2) G8(2.5,2) G9(3.5,2) G10(4.5,2) G11(5.5,2) H1(-4.5,1) H2(-3.5,1) H3(-2.5,1) H4(-1.5,1) H5(-0.5,1) H6(0.5,1) H7(1.5,1) H8(2.5,1) H9(3.5,1) H10(4.5,1) H11(5.5,1) J1(-4.5,0) J2(-3.5,0) J3(-2.5,0) J4(-1.5,0) J5(-0.5,0) J6(0.508,0) J7(1.5,0) J8(2.5,0) J9(3.5,0) J10(4.5,0) J11(5.5,0) K1(-4.5,-1) K2(-3.5,-1) K3(-2.5,-1) K4(-1.5,-1) K5(-0.5,-1) K6(0.5,-1) K7(1.5,-1) K8(2.5,-1) K9(3.5,-1) K10(4.5,-1) K11(5.5,-1) L2(-3.5,-2) L3(-2.5,-2) L4(-1.5,-2) L5(-0.5,-2) L6(0.5,-2) L7(1.5,-2) L8(2.5,-2) L9(3.5,-2) L10(4.5,-2) L11(5.5,-2) M2(-3.5,-3) M3(-2.5,-3) M4(-1.5,-3) M5(-0.5,-3) M6(0.5,-3) M7(1.5,-3) M8(2.5,-3) M9(3.5,-3) M11(5.5,-3) N2(-3.5,-4) N3(-2.5,-4) N4(-1.5,-4) N5(-0.5,-4) N6(0.5,-4) N7(1.5,-4) N8(2.5,-4) N9(3.5,-4) N11(5.5,-4) P0(-5.5,-5) P1(-4.5,-5) P2(-3.5,-5) P3(-2.5,-5) P4(-1.5,-5) P5(-0.5,-5) P6(0.5,-5) P7(1.5,-5) P8(2.5,-5) P9(3.5,-5) P11(5.5,-5) R0(-5.5,-6) R1(-4.5,-6) R10(4.5,-6) R11(5.5,-6) T1(-4.5,-7) T10(4.5,-7) U1(-4.5,-8) U2(-3.5,-8) U3(-2.5,-8) U4(-1.5,-8) U5(-0.5,-8) U8(2.5,-8) U9(3.5,-8) U10(4.5,-8)
  silkscreen extent -7.62,-9 7,9.65, body extent -7,-9 7,9, height 1.4
CAP0402 [mm]
  rect 0.51x0.535 smd mask+0.05: 1(-0.42,0) 2(0.42,0)
  silkscreen extent -0.85,-0.45 0.85,0.45, body extent -0.51,-0.25 0.51,0.25, height 0.51
CAP0603 [mm]
  rect 0.75x0.75 smd mask+0.05: 1(-0.72,0) 2(0.72,0)
  silkscreen extent -1.3,-0.55 1.3,0.55, body extent -0.8,-0.4 0.8,0.4, height 0.8
CAP1206 [mm]
  rect 1.15x1.8 smd: 1(-1.5,0) 2(1.5,0)
  silkscreen extent -2.3,-1.17 2.35,1.15, body extent -1.7,-0.9 1.7,0.9, height 0.88
CONN1X03 [mm]
  round 1.4 hole 0.8: 1(-2,0) 2(0,0) 3(2,0)
  round 0.75 hole 0.75 mask-0.5: ""(-2.95,-1.9) ""(2.95,1.9)
  rect 0.9x1.6 smd mask+0.05: ""(-2,-1.9) ""(0,-1.9) ""(2,-1.9) ""(2,1.9)
  rect 0.9x1.6 smd mask+0: ""(-2,1.9) ""(0,1.9)
  silkscreen extent -3.97,-2.55 3.58,2.68, body extent -3.25,-2.4 3.25,2.4, height 5.2
IMX6-SoM [mm]
  rect 0.8x1.5 smd: 1(-17.5,-17.85) 2(-16.5,-17.85) 3(-15.5,-17.85) 4(-14.5,-17.85) 5(-13.5,-17.85) 6(-12.5,-17.85) 7(-11.5,-17.85) 8(-10.5,-17.85) 9(-9.5,-17.85) 10(-8.5,-17.85) 11(-7.5,-17.85) 12(-6.5,-17.85) 13(-5.5,-17.85) 14(-4.5,-17.85) 15(-3.5,-17.85) 16(-2.5,-17.85) 17(-1.5,-17.85) 18(-0.5,-17.85) 19(0.5,-17.85) 20(1.5,-17.85) 21(2.5,-17.85) 22(3.5,-17.85) 23(4.5,-17.85) 24(5.5,-17.85) 25(6.5,-17.85) 26(7.5,-17.85) 27(8.5,-17.85) 28(9.5,-17.85) 29(10.5,-17.85) 30(11.5,-17.85) 31(12.5,-17.85) 32(13.5,-17.85) 33(14.5,-17.85) 34(15.5,-17.85) 35(16.5,-17.85) 36(17.5,-17.85) 71(17.5,17.85) 72(16.5,17.85) 73(15.5,17.85) 74(14.5,17.85) 75(13.5,17.85) 76(12.5,17.85) 77(11.5,17.85) 78(10.5,17.85) 79(9.5,17.85) 80(8.5,17.85) 81(7.5,17.85) 82(6.5,17.85) 83(5.5,17.85) 84(4.5,17.85) 85(3.5,17.85) 86(2.5,17.85) 87(1.5,17.85) 88(0.5,17.85) 89(-0.5,17.85) 90(-1.5,17.85) 91(-2.5,17.85) 92(-3.5,17.85) 93(-4.5,17.85) 94(-5.5,17.85) 95(-6.5,17.85) 96(-7.5,17.85) 97(-8.5,17.85) 98(-9.5,17.85) 99(-10.5,17.85) 100(-11.5,17.85) 101(-12.5,17.85) 102(-13.5,17.85) 103(-14.5,17.85) 104(-15.5,17.85) 105(-16.5,17.85) 106(-17.5,17.85)
  rect 1.5x0.8 smd: 37(18.85,-16.5) 38(18.85,-15.5) 39(18.85,-14.5) 40(18.85,-13.5) 41(18.85,-12.5) 42(18.85,-11.5) 43(18.85,-10.5) 44(18.85,-9.5) 45(18.85,-8.5) 46(18.85,-7.5) 47(18.85,-6.5) 48(18.85,-5.5) 49(18.85,-4.5) 50(18.85,-3.5) 51(18.85,-2.5) 52(18.85,-1.5) 53(18.85,-0.5) 54(18.85,0.5) 55(18.85,1.5) 56(18.85,2.5) 57(18.85,3.5) 58(18.85,4.5) 59(18.85,5.5) 60(18.85,6.5) 61(18.85,7.5) 62(18.85,8.5) 63(18.85,9.5) 64(18.85,10.5) 65(18.85,11.5) 66(18.85,12.5) 67(18.85,13.5) 68(18.85,14.5) 69(18.85,15.5) 70(18.85,16.5) 107(-18.85,16.5) 108(-18.85,15.5) 109(-18.85,14.5) 110(-18.85,13.5) 111(-18.85,12.5) 112(-18.85,11.5) 113(-18.85,10.5) 114(-18.85,9.5) 115(-18.85,8.5) 116(-18.85,7.5) 117(-18.85,6.5) 118(-18.85,5.5) 119(-18.85,4.5) 120(-18.85,3.5) 121(-18.85,2.5) 122(-18.85,1.5) 123(-18.85,0.5) 124(-18.85,-0.5) 125(-18.85,-1.5) 126(-18.85,-2.5) 127(-18.85,-3.5) 128(-18.85,-4.5) 129(-18.85,-5.5) 130(-18.85,-6.5) 131(-18.85,-7.5) 132(-18.85,-8.5) 133(-18.85,-9.5) 134(-18.85,-10.5) 135(-18.85,-11.5) 136(-18.85,-12.5) 137(-18.85,-13.5) 138(-18.85,-14.5) 139(-18.85,-15.5) 140(-18.85,-16.5)
  silkscreen extent -19.87,-18.9 19.6,18.6, body extent -19.5,-18.5 19.5,18.5, height 3
L_1212AB [mm]
  rect 1.75x0.6 smd: 1(-1.55,0) 2(1.55,0)
  silkscreen extent -1.83,-1.5 1.83,1.5, body extent -1.83,-1.45 1.83,1.55, height 2
PGAx13 [mm]
  rect 0.9x0.9 hole 0.6 mask+0.1: A1(0,0)
  round 0.9 hole 0.6 mask+0.1: A2(2.54,0) A3(5.08,0) A4(7.62,0) A5(10.16,0) A6(12.7,0) A7(15.24,0) A8(17.78,0) A9(20.32,0) A10(22.86,0) A11(25.4,0) A12(27.94,0) A13(30.48,0) B1(0,2.54) B2(2.54,2.54) B3(5.08,2.54) B4(7.62,2.54) B5(10.16,2.54) B6(12.7,2.54) B7(15.24,2.54) B8(17.78,2.54) B9(20.32,2.54) B10(22.86,2.54) B11(25.4,2.54) B12(27.94,2.54) B13(30.48,2.54) D1(0,7.62) D2(2.54,7.62) D3(5.08,7.62) D4(7.62,7.62) D5(10.16,7.62) D6(12.7,7.62) D7(15.24,7.62) D8(17.78,7.62) D9(20.32,7.62) D10(22.86,7.62) D11(25.4,7.62) D12(27.94,7.62) D13(30.48,7.62) E1(0,10.16) E2(2.54,10.16) E3(5.08,10.16) E4(7.62,10.16) E5(10.16,10.16) E6(12.7,10.16) E7(15.24,10.16) E8(17.78,10.16) E9(20.32,10.16) E10(22.86,10.16) E11(25.4,10.16) E12(27.94,10.16) E13(30.48,10.16) M1(0,27.94) M2(2.54,27.94) M3(5.08,27.94) M4(7.62,27.94) M5(10.16,27.94) M6(12.7,27.94) M7(15.24,27.94) M8(17.78,27.94) M9(20.32,27.94) M10(22.86,27.94) M11(25.4,27.94) M12(27.94,27.94) M13(30.48,27.94)
  silkscreen extent -4,-1.64 35.02,32.36
QFN64 [mm] "QFN, 64-Leads, Body 9.00x9.00mm, Pitch 0.50mm, Thermal Pad 7.25x7.25mm, IPC Medium Density"
  oval 0.85x0.25 smd mask+0.05: 1(-4.375,3.75) 16(-4.375,-3.75) 33(4.375,-3.75) 48(4.375,3.75)
  oval 0.85x0.25 smd mask+0.07: 2(-4.375,3.25) 3(-4.375,2.75) 4(-4.375,2.25) 5(-4.375,1.75) 6(-4.375,1.25) 7(-4.375,0.75) 8(-4.375,0.25) 9(-4.375,-0.25) 10(-4.375,-0.75) 11(-4.375,-1.25) 12(-4.375,-1.75) 13(-4.375,-2.25) 14(-4.375,-2.75) 15(-4.375,-3.25) 34(4.375,-3.25) 35(4.375,-2.75) 36(4.375,-2.25) 37(4.375,-1.75) 38(4.375,-1.25) 39(4.375,-0.75) 40(4.375,-0.25) 41(4.375,0.25) 42(4.375,0.75) 43(4.375,1.25) 44(4.375,1.75) 45(4.375,2.25) 46(4.375,2.75) 47(4.375,3.25)
  oval 0.25x0.85 smd mask+0.05: 17(-3.75,-4.375) 32(3.75,-4.375) 49(3.75,4.375) 64(-3.75,4.375)
  oval 0.25x0.85 smd mask+0.07: 18(-3.25,-4.375) 19(-2.75,-4.375) 20(-2.25,-4.375) 21(-1.75,-4.375) 22(-1.25,-4.375) 23(-0.75,-4.375) 24(-0.25,-4.375) 25(0.25,-4.375) 26(0.75,-4.375) 27(1.25,-4.375) 28(1.75,-4.375) 29(2.25,-4.375) 30(2.75,-4.375) 31(3.25,-4.375) 50(3.25,4.375) 51(2.75,4.375) 52(2.25,4.375) 53(1.75,4.375) 54(1.25,4.375) 55(0.75,4.375) 56(0.25,4.375) 57(-0.25,4.375) 58(-0.75,4.375) 59(-1.25,4.375) 60(-1.75,4.375) 61(-2.25,4.375) 62(-2.75,4.375) 63(-3.25,4.375)
  rect 7.25x7.25 smd paste+0 mask+0.07: ""(-0.001,-0.007)
  silkscreen extent -5.5,-4.72 4.72,4.72, body extent -4.57,-4.57 4.57,4.57, height 0.8
RES0402 [mm]
  rect 0.51x0.54 smd mask+0.05: 1(-0.41,0) 2(0.41,0)
  silkscreen extent -0.85,-0.45 0.85,0.45, body extent -0.5,-0.25 0.5,0.25, height 0.35
TestPoint_2019 [mm]
  round 0.5 smd paste-10 mask+0.1: 1(0,0)

## Part data
C1001 C1002 C1003 C1004 C1101 C1102 C1103 C1104 C2002 C2003 C2004 C2102 C2103 C2104 C3001 C3002 C3004 C3005 C3006 C3007 C4009 C5002 C5003 C5004 C5005 C5006 C6001 C6002 C6003: library part C0402_100nF, "CAP CER 100nF SMD 0402", Manufacturer=Murata, Manufacturer Part Number=GJM1555C1H100JB01D, Footprint Name=0402, Parameter 1=50V
C1005 C1105 C2001 C2101 C3000 C4001 C4002 C5001: library part C0603_10uF, "CAP CER 10uF  SMD 0603", Manufacturer=Murata, Manufacturer Part Number=GJM1555C1H100JB01D, Footprint Name=0603
C3003: library part C0402_10nF, "CAP CER 10nF SMD 0402", Manufacturer=Murata, Manufacturer Part Number=GJM1555C1H100JB01D, Footprint Name=0402, Parameter 1=50V
C4003 C4004 C4005 C4006 C4007 C4008 C4019: library part C0603_2.2uF, "CAP CER 2.2uF  SMD 0603", Manufacturer=Murata, Manufacturer Part Number=GJM1555C1H100JB01D, Footprint Name=0603
C4010 C4012: library part C0402_4.7uF, "CAP CER 4.7upF SMD 0402", Manufacturer=Murata, Manufacturer Part Number=GJM1555C1H100JB01D, Footprint Name=0402, Parameter 1=50V
C4011 C4013 C4015 C4017: library part C1206_47uF, "CAP CER 47uF  SMD 1206", Manufacturer=Murata, Manufacturer Part Number=GJM1555C1H100JB01D, Footprint Name=1206
C4014 C4016: library part C0603_4.7uF, "CAP CER 4.7uF  SMD 0603", Manufacturer=Murata, Manufacturer Part Number=GJM1555C1H100JB01D, Footprint Name=0603
IC1000: library part 1IMG219
IC3000: "528MHz NXP i.MX 6UL/6ULL ARM Cortex-A7 Processors"
IC5000: "BGA100"
IC6000: "MOD26"
L4000 L4002 L4003 L4004: library part IHLP1212AB
R4001: library part R0402_4.7k, "RES TKF 4.7k SMD 0402", Manufacturer="TE Connectivity", Manufacturer Part Number=CRG0402F10K, Tolerance=1%, Footprint Name=0402
R4002 R4003 R4006 R4007 R4008 R4009: library part R0402_0R, "RES TKF 0R  SMD 0402", Manufacturer="TE Connectivity", Manufacturer Part Number=CRG0402F10K, Tolerance=1%, Footprint Name=0402
R4004: library part R0402_49.9R, "RES TKF 49.9R SMD 0402", Manufacturer="TE Connectivity", Manufacturer Part Number=CRG0402F10K, Tolerance=1%, Footprint Name=0402
R4005: library part R0402_10k, "RES TKF 10k  SMD 0402", Manufacturer="TE Connectivity", Manufacturer Part Number=CRG0402F10K, Tolerance=1%, Footprint Name=0402
TH4000: library part Thermistor, "THERMISTOR 10K OHM  0402"
TP3000 TP3001 TP3002 TP3003 TP3004 TP3005 TP3006 TP3007 TP3008 TP4010 TP4011 TP_CLK TP_CMD TP_D0 TP_D1 TP_D2 TP_D3 TP_D4 TP_D5 TP_D6 TP_D7 TP_DS TP_RST: "SMD test point", Manufacturer=NA, .Checked_PCB=AI, .Checked_SCH=AI, .Creator=RV, Manufacturer Part Number=NA

## Via types
v1: diameter 0.4, hole 0.2, Signal 1 to Signal 8, 276 vias
v2: diameter 0.6, hole 0.3, Signal 1 to Signal 8, 49 vias
v3: diameter 0.325, hole 0.125, Signal 1 to GND/Signal 2, 9 vias
v4: diameter 0.5, hole 0.2, GND/Signal 2 to GND 7, 9 vias
v5: diameter 0.4, hole 0.2, Signal 1 to Signal 8, tented both sides, 9 vias

## Nets (pads, with @x,y where several pads share a name; then routed paths per layer and width w, separated by ;. In a path a pad name is that pad's centre, name@x,y a point inside that pad or via, vN(x,y) a via of type N, cw(c..) or ccw(c..) an arc to the next point about the centre after c; other vN are vias at no path point)
+V_IN: C4001.2 C4002.2 C4003.2 C4004.1 C4005.1 C4009.2 C4010.1 C4012.1 C4014.1 C4016.1 CN40000.2 IC4000.8 IC4000.10 IC4000.18 IC4000.22 IC4000.29 IC4000.32 IC4000.34 IC4000.37 IC4000.42 IC4000.46 R4001.2 | length 27.8
  Signal 1 w0.1: C4009.2@91.22,21.5 91.62,21.5 92,21.88 v1(92,21.9) 92.45,22.35 IC4000.34@93.175,22.35 93.65,22.35 93.8,22.5 93.8,23 93.65,23.15 IC4000.32@93.175,23.15 ; C4010.1@91.6,25.3 92.1,24.8 v1(92.25,24.8) 92.3,24.8 92.75,24.35 IC4000.29@93.175,24.35 ; C4012.1@91.7,23.8 v1(92.2,23.8) ; v1(91.9,20.7) 92.115,20.485 C4002.2@92.115,19.65 ; v1(93.3,20) 93.3,20.075 IC4000.37@93.975,20.75 ; IC4000.22@94.775,26.75 94.775,26.125 94.9,26 96.2,26 96.375,26.175 IC4000.18@96.375,26.75 v1(96.375,27.702) 96.375,28.655 C4016.1@96.4,28.68 C4003.2@95.1,28.68 ; IC4000.42@95.975,20.75 95.975,21.375 96.1,21.5 97.5,21.5 97.575,21.425 IC4000.46@97.575,20.75 97.575,20.252 v1(98.109,19.719) 98.88,18.947 C4005.1@98.88,18.5 v1@98,18.5 ; v1(97.9,17.1) C4001.2@98.86,17.1 98.86,16.14 v1@98.84,16.14 ; IC4000.8@99.175,24.35 99.49,24.35 C4004.1@100.5,23.34 ; IC4000.10@99.175,25.15 99.95,25.15 v1(100,25.1) ; v1(100.1,26.4) C4014.1@100.88,26.4 ; R4001.2@102.525,28.96 v1@102.525,29.85
  other v1: 98.869,16.159 98.009,18.519 100.004,23.864 102.534,29.869
+V_LDO_RF_3V3: C4019.2 IC4000.23 | length 1.9
  Signal 1 w0.1: C4019.2@93.5,27.9 94.1,27.9 94.4,27.6 94.4,26.775 IC4000.23@94.375,26.75
+V_SMPS_1V8: C1101.2 C1102.2 C1103.2 C1104.2 C1105.2 C2101.2 C2102.2 C2103.2 C2104.2 C4011.2 C4013.2 IC1000.A1 IC1000.A2 IC1000.A3 IC1000.A4 IC1000.A5 IC1000.A6 IC1000.A7 IC1000.D7 IC1000.D9 IC1000.D11 IC1000.D13 IC2000.35 L4000.2 L4002.2 R4006.2 R4007.2 TP3006.1 | length 286
  Signal 1 w0.1: C4011.2@85.675,17.05 85.725,17.1 L4000.2@85.725,20.05 ; v1(89.824,26.805) 89.829,26.8 90.38,26.8 R4007.2@90.795,26.385 ; R4007.2@90.795,26.4 88.475,26.4 88.475,27.025 87.3,28.2 84.8,28.2 83.8,27.2 83.8,21.975 L4000.2@85.725,20.05 ; R4006.2@90.875,22.65 88.975,22.65 C4013.2@88.575,23.05 85.725,20.2 L4000.2@85.725,20.05 ; v1(107.324,76.005) 107.324,77.131 107.28,77.175 107.28,77.677 108.061,78.457 108.061,79.656 108.08,79.675 108.06,79.695 C2104.2@108.06,80.675 ; C2104.2@108.08,80.6 108.12,80.64 108.1,80.66 v1(108.1,81.3) ; IC2000.35@109.274,91.04 109.274,92.206 v1(109.576,92.507) ; C1104.2@241.1,78.32 v1@241.1,79.1 ; 243.5,78.6 v1(243.5,79.125) ; C1102.2@246.3,78.32 v1@246.3,79 ; C1101.2@248.6,78.32 v1@248.6,79.1 ; v1@251.118,79.282 C1105.2@251.118,78.375 251.168,78.425 v1(252.2,78.425) 253.3,77.325 TP3006.1@253.3,69.7
  Signal 4 w0.1: v1(89.824,26.805) 89.824,31.676 91.9,33.752 91.9,45.6 107.3,61 v1@107.3,76
  Power/Signal 6 w0.1: v1(109.576,92.507) 109.576,91.769 109.074,91.267 109.074,85.479 109.074,82.274 v1(108.1,81.3) 108.5,80.9 144.3,80.9 150.8,74.4 192.3,74.4 194.5,76.6 210.7,76.6 215.4,71.9 233.6,71.9 235.76,74.06 IC1000.A7@235.76,81.24 235.76,82.04 234.7,83.1 234.7,85.3 235.76,86.36 IC1000.D7@235.76,88.56 ; IC1000.D13@220.52,88.86 220.52,87.98 220.94,87.56 224.3,87.56 IC1000.D11@225.6,88.86 225.6,88.2 226.1,87.7 229.52,87.7 IC1000.D9@230.68,88.86 232.04,87.5 234.7,87.5 IC1000.D7@235.76,88.56 ; IC1000.D7@235.76,88.86 IC1000.D7@235.76,88.56
  other v1: 246.3,79.025 241.1,79.125 248.6,79.125 251.098,79.308
+V_SMPS_3V3: C1001.2 C1002.2 C1003.2 C1004.2 C1005.2 C2001.2 C2002.2 C2003.2 C2004.2 C3000.1 C3001.1 C3002.1 C3003.1 C3004.1 C3005.1 C3006.1 C3007.1 C4015.2 C4017.2 C5001.1 C5002.1 C5003.1 C5004.2 C5005.2 C5006.2 IC1000.A8 IC1000.A9 IC1000.A10 IC1000.A11 IC1000.A12 IC1000.A13 IC2000.50 IC2000.57 IC2000.60 IC3000.7 IC3000.9 IC3000.11 IC3000.13 IC3000.15 IC3000.37 IC3000.38 IC3000.39 IC3000.109 IC3000.110 IC3000.111 IC3000.112 IC5000.E4 IC5000.F2 IC5000.F3 IC5000.F4 IC5000.F5 IC5000.F6 IC5000.F7 IC5000.F8 IC5000.F9 IC5000.H3 IC5000.H8 IC5000.L2 IC5000.L4 IC5000.L7 IC5000.L9 IC5000.P3 IC5000.P8 L4003.2 L4004.2 R4008.2 R4009.2 TP3008.1 | length 356.6
  Signal 1 w0.07: IC2000.60@102.149,84.915 100.96,84.915 100.4,85.475 100.4,86 100.815,86.415 100.78,86.45 ; IC2000.57@102.149,86.415 101.429,86.415 101.394,86.45 100.78,86.45 ; IC2000.50@102.149,89.915 101.215,89.915 v1(100.4,89.1) 100.4,86.831 100.78,86.45
  Signal 1 w0.09: IC5000.P3@141.7,95.35 141.725,95.35 142.175,95.8 v1(142.2,95.8) ; v1(145.7,103.35) IC5000.F8@146.7,103.35 IC5000.F9@147.7,103.35 ; v1(146.2,95.9) 146.2,95.875 146.7,95.375 IC5000.P8@146.7,95.35 ; IC5000.L9@147.7,98.35 v1(148.2,97.85)
  Signal 1 w0.1: C4017.2@88.6,32.9 91.15,32.9 L4004.2@91.35,32.7 92.15,33.5 v1(95.6,33.5) 97.6,31.5 R4009.2@97.6,30.51 102.89,30.51 103.225,30.175 103.225,27.5 C4015.2@104.875,25.85 ; R4008.2@101.605,24.75 101.955,25.1 ; L4003.2@105.65,23 105.65,25.075 C4015.2@104.875,25.85 ; v1(142.225,98.825) IC5000.L4@142.7,98.35 ; IC3000.109@157.125,77.3 157.125,75.575 C3000.1@158,74.7 ; IC3000.110@158.125,77.3 158.025,77.2 C3000.1@158.025,74.425 ; IC3000.111@159.125,77.3 159.125,75.525 159.1,75.5 ; IC3000.112@160.125,77.3 160.125,76.325 159.3,75.5 159.1,75.5 ; IC3000.39@186.125,115 186.125,116.025 186.7,116.6 187.8,116.6 ; IC3000.38@187.125,115 187.125,115.925 187.8,116.6 ; IC3000.37@188.125,115 188.125,116.125 188.6,116.6 ; IC3000.7@189.475,84.65 v1(192.6,84.65) ; IC3000.9@189.475,86.65 191.65,86.65 192.6,85.7 ; IC3000.11@189.475,88.65 191.85,88.65 192.6,87.9 ; IC3000.13@189.475,90.65 191.65,90.65 192.6,89.7 ; IC3000.15@189.475,92.65 191.95,92.65 192.6,92 ; v1(219.48,77.72) C1005.2@220.5,77.72 220.475,77.745 v1(220.475,78.625) v1@220.475,78.7 ; C1004.2@223,77.62 v1(223,78.55) ; C1003.2@225.6,77.72 v1(225.6,78.5) ; C1002.2@228.2,77.72 v1@228.2,78.525 ; v1(230.775,78.7) 230.8,78.675 C1001.2@230.8,77.9 230.875,77.975 v1@231.675,77.975 ; v1(231.675,78) 231.9,78 233.1,76.8 TP3008.1@233.1,69.7 ; 101.955,25.1 104.125,25.1 C4015.2@104.875,25.85 ; 101.955,25.1 101.955,25.16 101.895,25.1 101.955,25.1 ; C3000.1@158,74.4 158.025,74.375 C3000.1@158.025,74.4 ; C3000.1@158,74.4 C3000.1@158.025,74.425 ; C3000.1@158,74.4 C3000.1@158.025,74.4 ; C3000.1@158.025,74.4 159.88,74.4 C3001.1@159.9,74.42 C3002.1@161.9,74.42 C3003.1@163.9,74.42 C3004.1@165.9,74.42 C3005.1@167.9,74.42 C3006.1@169.9,74.42 C3007.1@171.9,74.42 188.82,74.42 192.6,78.2 v1(192.6,84.65) ; C3000.1@158.025,74.4 C3000.1@158.025,74.425 ; C3000.1@158.025,74.425 159.1,75.5 ; 187.8,116.6 188.6,116.6 ; 188.6,116.6 192.4,116.6 193.1,115.9 193.1,92.5 192.6,92 ; v1(192.6,84.65) 192.6,85.7 ; 192.6,85.7 192.6,87.9 ; 192.6,87.9 192.6,89.7 ; 192.6,89.7 192.6,92
  Power/Signal 6 w0.07: v1(100.4,89.1) 102.3,91 107.935,91 108.915,91.98 108.915,92.108 109.018,92.21 109.018,92.423 110.295,93.7 134.5,93.7 140.2,93.7 142.2,95.7 v1(142.2,95.8)
  Power/Signal 6 w0.09: v1(148.2,97.85) 149.6,96.45 149.6,82.3 154,77.9 154,76.4 155.1,75.3 157.992,75.3 v1(158.027,75.335)
  Power/Signal 6 w0.1: v1(95.6,33.5) 95.6,48.6 102.034,55.034 102.034,83.866 v1(100.4,85.5) ; v1(192.6,84.65) 212.675,84.65 216.085,81.24 IC1000.A13@220.52,81.24
  Signal 8 w0.07: v1(145.727,98.335) 146.213,97.85 v1(148.2,97.85)
  Signal 8 w0.09: 141.827,102.911 141.7,102.784 v1(141.7,101.35) 142.225,100.825 v1(142.225,98.825) 141.75,98.35 v1(140.7,98.35) 140.7,97.225 142.125,95.8 v1(142.2,95.8) 146.175,95.8 146.2,95.775 v1(146.2,95.9) 146.275,95.825 147.975,95.825 148.2,96.05 v1(148.2,97.85) 148.2,99.85 v1(146.7,101.35)
  Signal 8 w0.1: v1(140.7,103.35) v1(141.7,103.35)
  other v1: 228.225,78.55 142.7,103.35 143.7,103.35 144.7,103.35 142.7,104.35
ADC_CLK_N: IC1000.D2 IC2000.59 IC3000.33 | length 189.8
  Signal 1 w0.09: v1(101.1,85.4) 101.32,85.62 101.474,85.62 101.679,85.415 IC2000.59@102.149,85.415 ; IC3000.33@189.475,110.65 190.27,110.65 190.644,111.024 v1(192.724,111.024) ; v1(244.2,90.1) 247.22,90.1 IC1000.D2@248.46,88.86
  Signal 4 w0.09: v1(101.1,85.4) 100.61,85.89 100.61,88.579 101.91,89.879 101.91,94.179 114.321,106.59 116.9,106.59 119.41,109.1 188.5,109.1 190.556,111.156 191.456,111.156 191.924,111.624 191.924,111.657 v1(191.9,111.681) ; v1(192.724,111.024) 192.8,111.1 194.5,111.1 203.5,111.1 243.405,111.1 244.6,109.905 244.6,90.5 v1(244.2,90.1)
  Signal 8 w0.09: v1(191.9,111.681) 191.9,111.6 192.6,110.9 v1(192.724,111.024)
ADC_CLK_P: IC1000.D3 IC2000.58 IC3000.34 | length 185.6
  Signal 1 w0.09: v1(101.1,86) 101.29,85.81 101.574,85.81 101.679,85.915 IC2000.58@102.149,85.915 ; IC3000.34@189.475,111.65 190.27,111.65 190.625,111.295 192.002,111.295 192.307,111.6 v1(192.7,111.6)
  Signal 4 w0.09: v1(101.1,86) 100.8,86.3 100.8,88.5 102.1,89.8 102.1,94.1 114.4,106.4 116.979,106.4 119.489,108.91 188.579,108.91 190.634,110.966 192.166,110.966 192.676,111.476 v1@192.7,111.5 ; v1(192.7,111.6) v1@192.7,111.5 ; IC1000.D3@245.92,88.86 244.79,89.99 244.79,109.984 243.274,111.5 203.5,111.5 194.5,111.5 v1@192.7,111.5
ADC_RESET: IC2000.64 IC3000.41 | length 109.8
  Signal 1 w0.1: v1(101.4,82.4) 101.915,82.915 IC2000.64@102.149,82.915 ; IC3000.41@184.125,115 184.224,115.099 v1(184.224,116.605)
  GND/Signal 2 w0.1: v4(184.181,99.13) 184.181,116.581 v1@184.2,116.6
  Signal 4 w0.1: v1(101.4,82.4) 103.2,84.2 111,84.2 125.975,99.175 144.625,99.175 144.7,99.1 v4@184.1,99.1
BIT_CLK_N: IC2000.26 IC3000.108 | length 54.5
  Signal 1 w0.2: IC2000.26@110.899,87.415 110.934,87.38 122.328,87.38 122.397,87.45 122.675,87.45 v1(122.675,87.417) ; v1(136.675,87.253) 136.895,87.033 136.895,86.997 143.497,80.395 149.31,80.395 149.38,80.325 149.6,80.325 v1(149.6,80.355) ; v1(155.905,75.8) 155.905,77.08 IC3000.108@156.125,77.3
  Signal 4 w0.09: v1(122.675,87.417) 122.697,87.395 122.814,87.395 122.955,87.253 v1(136.675,87.253) ; v1(149.6,80.355) 151.13,78.825 151.13,75.255 151.53,74.855 155.132,74.855 155.783,75.506 155.88,75.603 155.88,75.8 v1(155.905,75.8)
BIT_CLK_P: IC2000.25 IC3000.107 | length 54.5
  Signal 1 w0.2: IC2000.25@110.899,86.915 110.934,86.95 122.325,86.95 122.455,86.82 122.617,86.82 v1(122.617,86.92) ; v1(137.325,87.175) 143.675,80.825 149.25,80.825 149.38,80.955 149.6,80.955 v1(149.6,80.855) ; IC3000.107@155.125,77.3 155.405,77.02 v1(155.405,75.8)
  Signal 4 w0.09: v1(122.617,86.92) 122.638,86.942 122.814,86.942 122.823,86.933 136.323,86.933 136.478,86.778 136.872,86.778 137.15,87.057 137.15,87.175 v1(137.325,87.175) ; v1(149.6,80.855) 149.625,80.83 149.797,80.83 150.075,80.552 150.075,80.38 151.45,79.005 151.45,75.575 151.85,75.175 154.999,75.175 155.437,75.613 155.25,75.8 v1(155.405,75.8)
eMMC_CLK: IC3000.74 IC5000.P6 TP_CMD.1 | length 24.7
  Signal 1 w0.09: v3(144.2,95.8) 144.65,95.35 IC5000.P6@144.7,95.35 ; v1@152.4,110.5 152.55,110.65 IC3000.74@153.775,110.65
  GND/Signal 2 w0.09: v3(144.2,95.8) 142.7,97.3 142.7,99.6 151.5,108.4 151.5,109.59 v1(152.4,110.49)
  Signal 8 w0.09: v1(152.4,110.49) 155.448,110.49 TP_CMD.1@155.6,110.642
eMMC_CMD: IC3000.72 IC5000.P5 TP_CLK.1 | length 38.1
  Signal 1 w0.09: IC5000.P5@143.7,95.35 143.175,94.825 140.5,94.825 140.125,95.2 140.125,96.175 139.05,97.25 139.05,108.025 139.35,108.325 139.35,108.495 143.505,112.65 IC3000.72@153.775,112.65
  Signal 8 w0.09: v1(151.486,112.649) TP_CLK.1@155.677,112.649
eMMC_DATA0: IC3000.78 IC5000.K2 TP_D0.1 | length 23.7
  Signal 1 w0.09: IC5000.K2@140.7,99.35 140.55,99.35 140.175,99.725 140.175,105.45 140.575,105.85 149.625,105.85 150.425,106.65 IC3000.78@153.775,106.65
  Signal 8 w0.09: v1(152.4,106.629) 155.499,106.629 TP_D0.1@155.55,106.578
eMMC_DATA1: IC3000.79 IC5000.N2 TP_D1.1 | length 26.7
  Signal 1 w0.09: IC5000.N2@140.7,96.35 141.3,96.95 141.3,104.6 141.55,104.85 150.35,104.85 v1(150.6,105.1) 150.6,105.175 151.075,105.65 IC3000.79@153.775,105.65
  Signal 8 w0.09: v1(150.6,105.1) 153.1,105.1 153.7,105.7 155.514,105.7 TP_D1.1@155.575,105.639
eMMC_DATA2: IC3000.80 IC5000.K3 TP_D2.1 | length 21.3
  Signal 1 w0.09: IC5000.K3@141.7,99.35 142.225,99.875 142.225,103.575 142.575,103.925 150.825,103.925 v1(151.1,104.2) 151.1,104.275 151.475,104.65 IC3000.80@153.775,104.65
  Signal 8 w0.09: v1@151.1,104.1 151.292,104.292 155.194,104.292 TP_D2.1@155.626,104.724
eMMC_DATA3: IC3000.81 IC5000.N3 TP_D3.1 | length 21.8
  Signal 1 w0.09: IC5000.N3@141.7,96.35 142.2,96.85 144.8,96.85 145.175,97.225 145.175,102.45 145.575,102.85 151.85,102.85 152.222,103.222 v1(152.222,103.251) 152.621,103.65 IC3000.81@153.775,103.65
  Signal 8 w0.09: v1(152.222,103.251) 155.372,103.251 TP_D3.1@155.677,103.556
eMMC_DATA4: IC3000.82 IC5000.N8 TP_D4.1 | length 17.4
  Signal 1 w0.09: IC5000.N8@146.7,96.35 146.2,96.85 146.2,101.5 146.6,101.9 151.525,101.9 152.275,102.65 IC3000.82@153.775,102.65
  Signal 8 w0.09: v1(151.968,102.337) 155.727,102.337 TP_D4.1@155.88,102.489